# Altium PCB 0.PCB1.PcbDoc (part 1 of 12)
Units mm, origin at the board's own origin, x right, y up, seen from the top; angles counter-clockwise.
Board outline 77 x 72 mm, 6 copper layers (Top Layer, Layer 1, Layer 3, Layer 4, Layer 2, Bottom Layer), stack 1.538 mm thick; 570 components, 490 nets, 3331 pads, 1909 vias.
Unrouted connection lines stored in the file: 2.
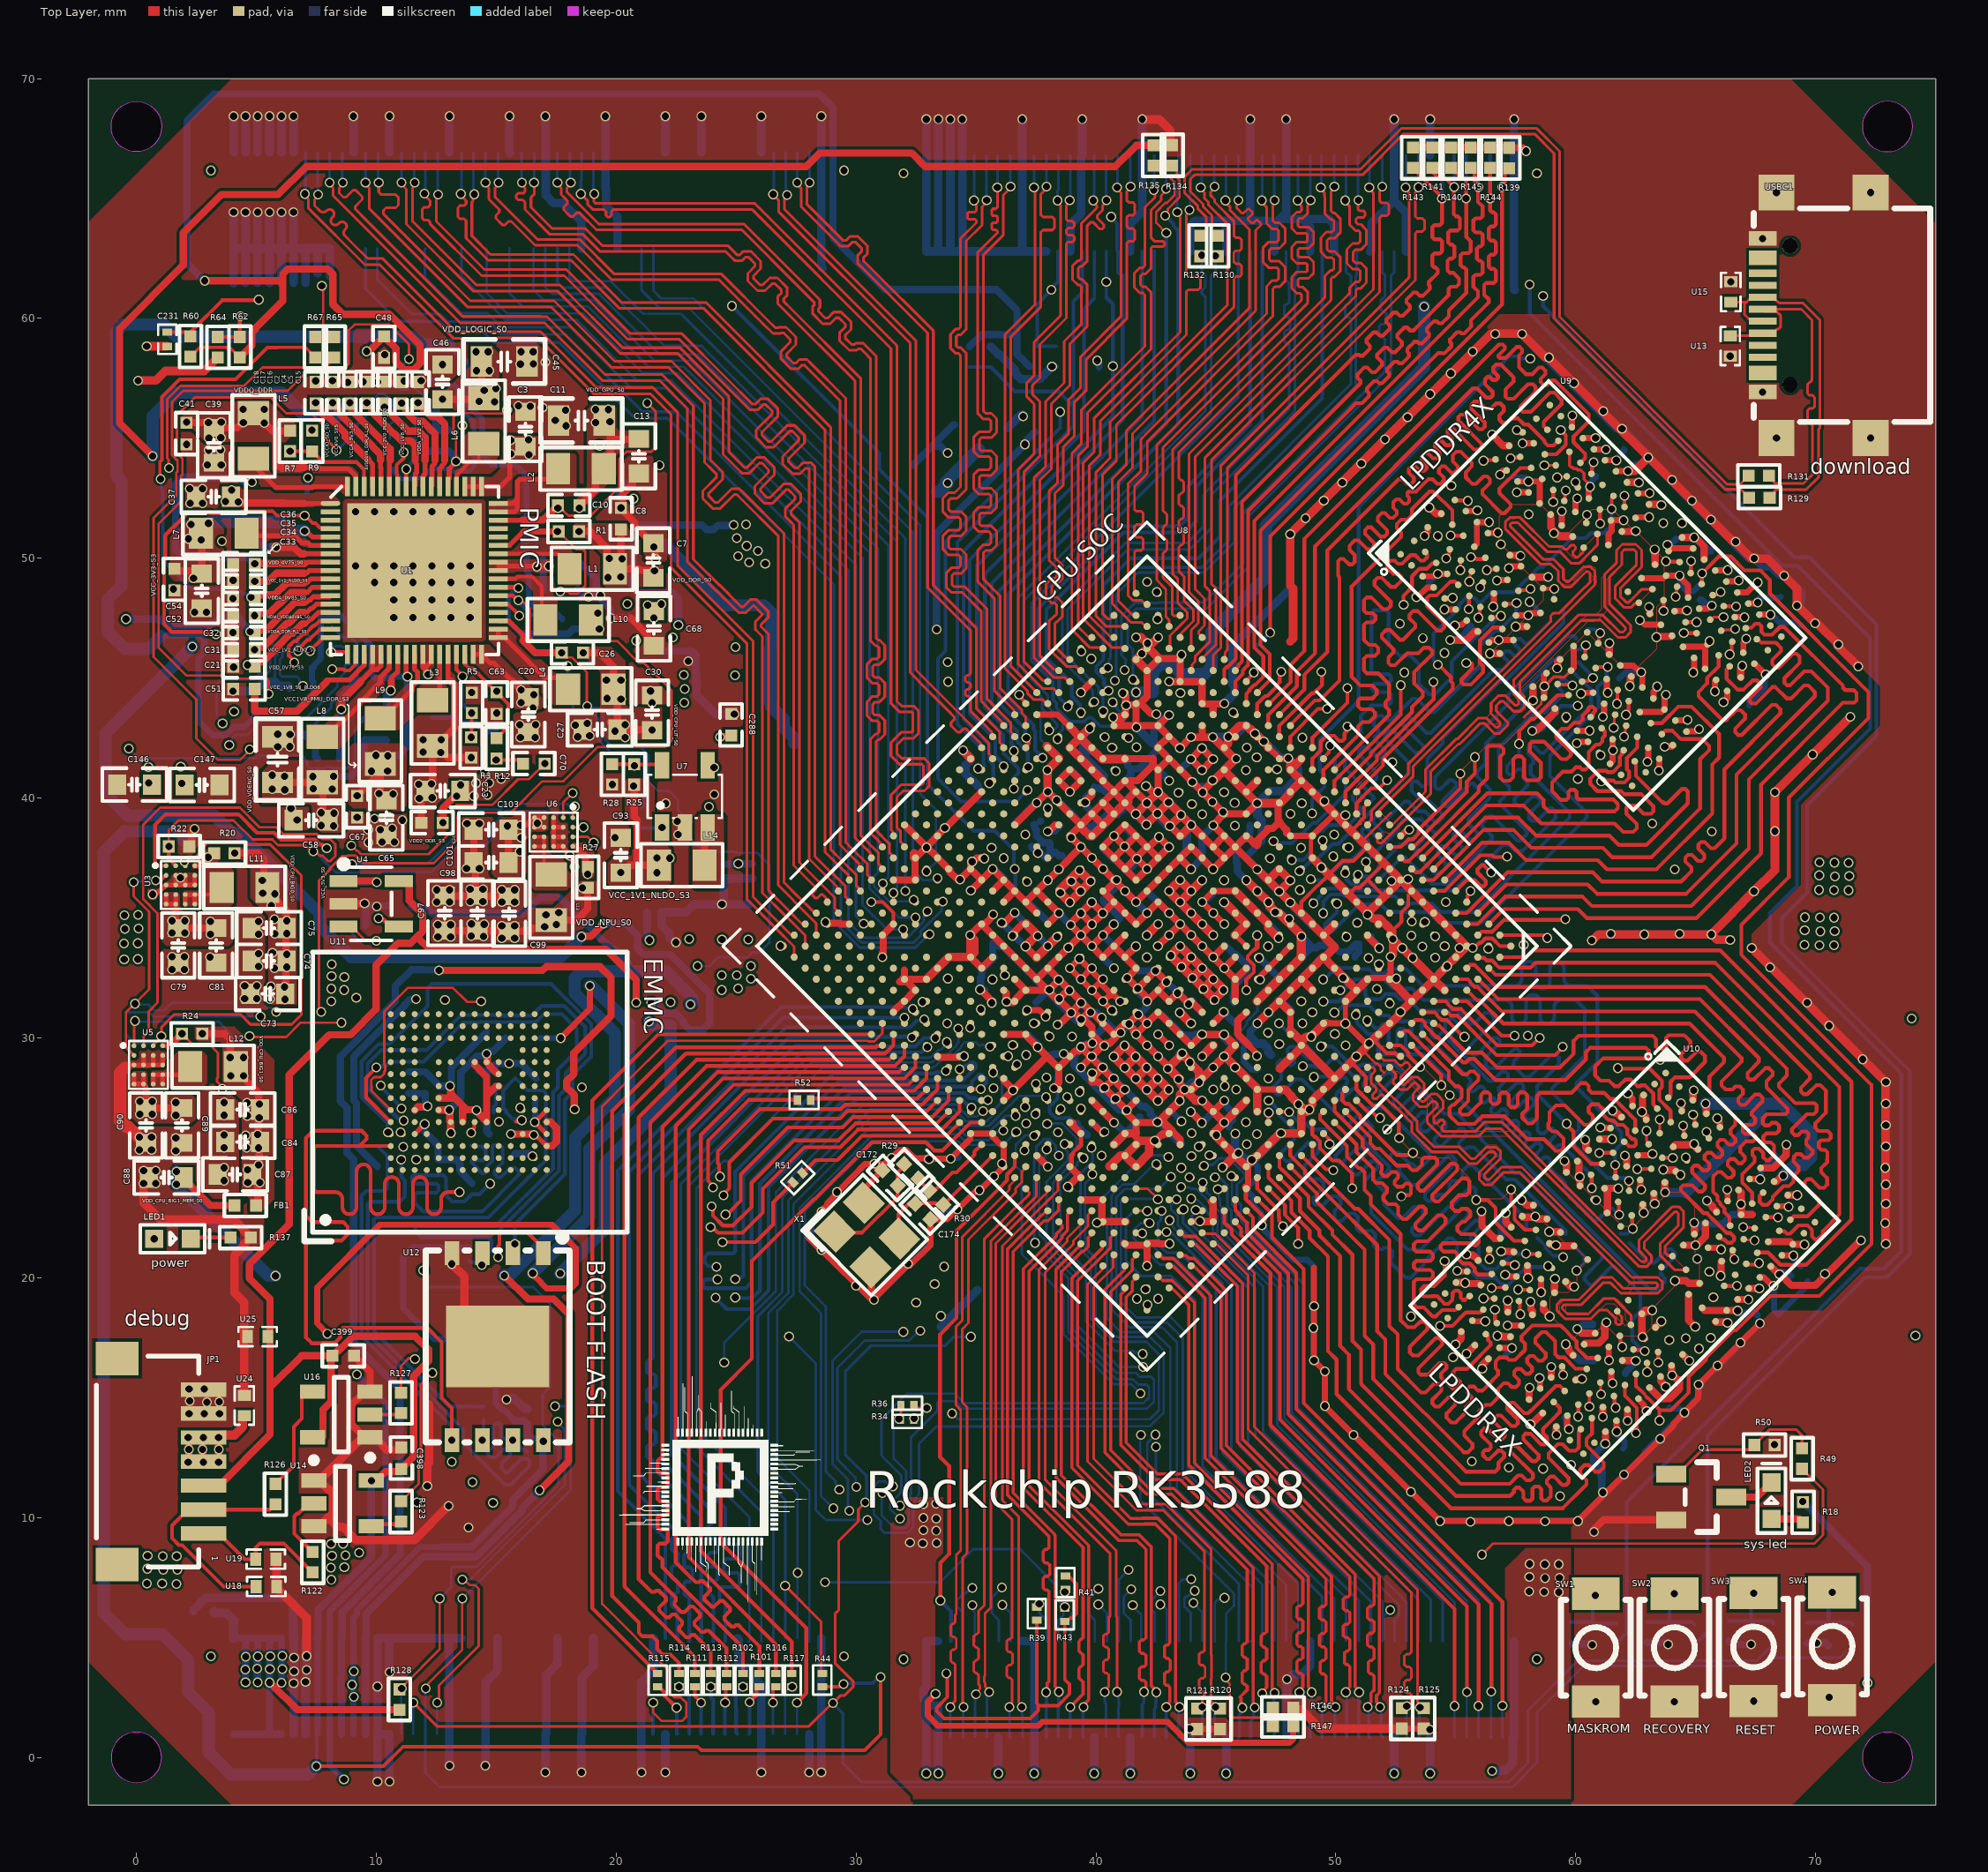
[diagram p0: Top Layer view]
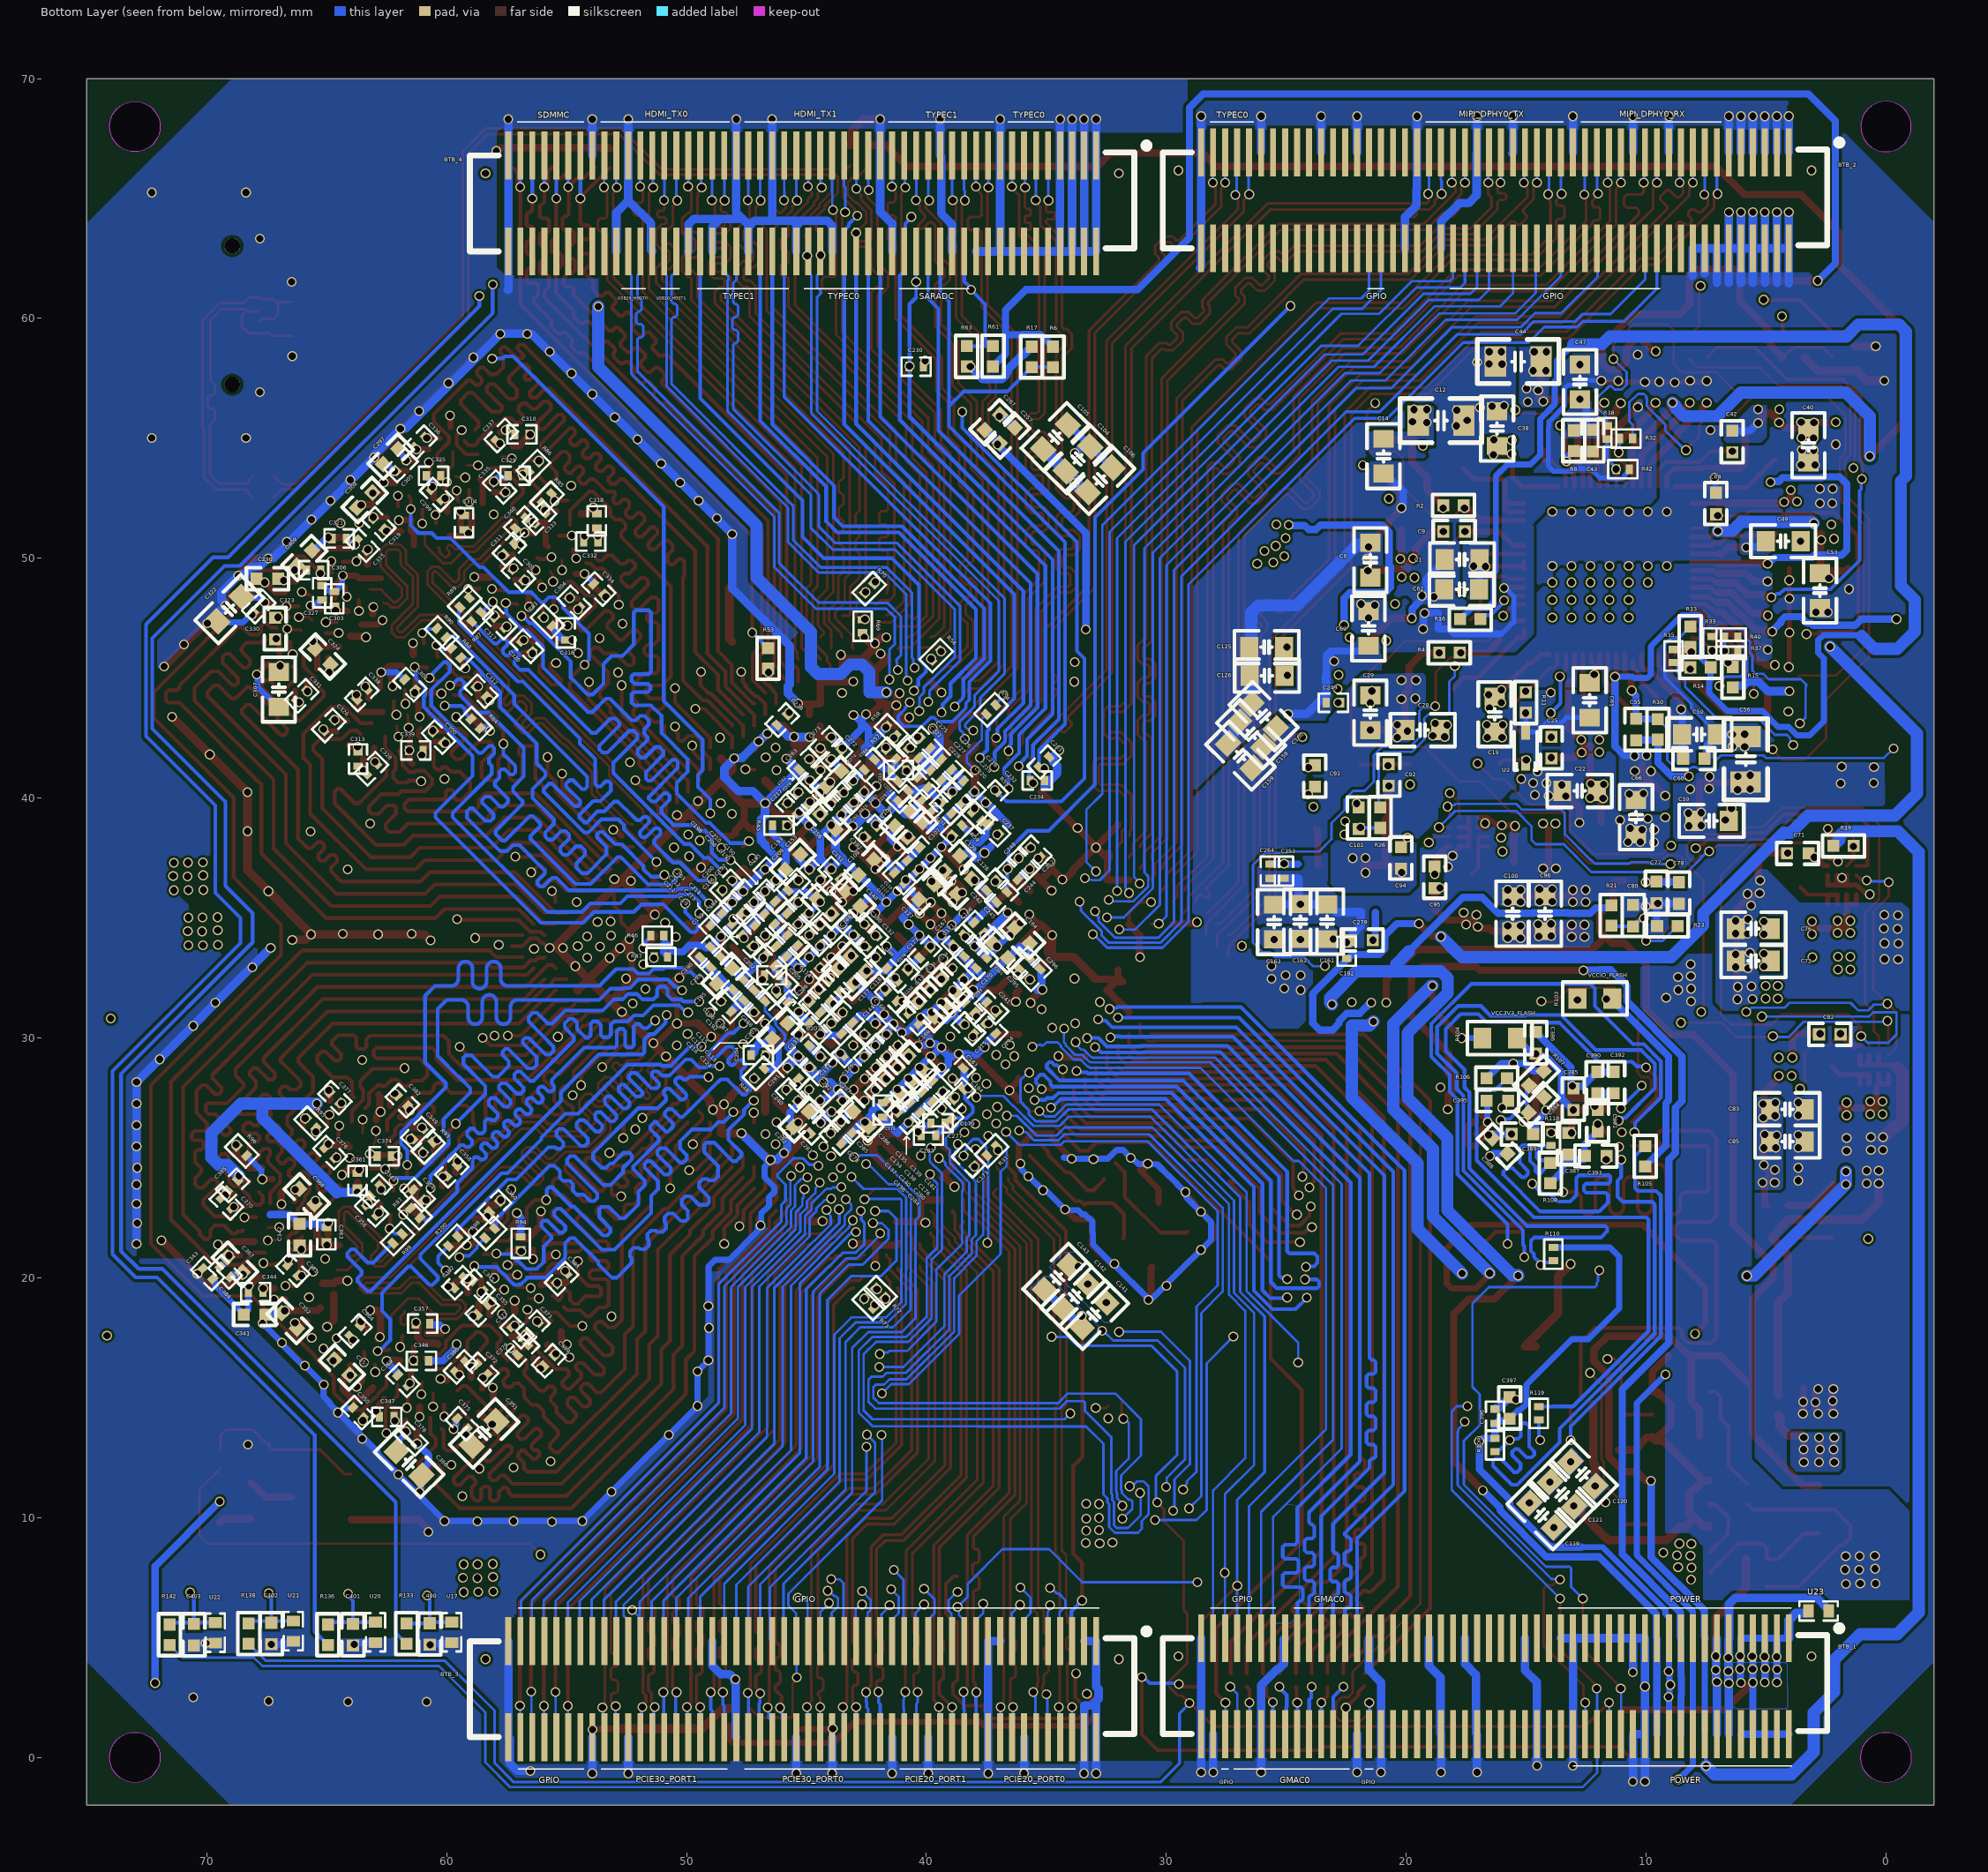
[diagram p1: Bottom Layer view, seen from below]
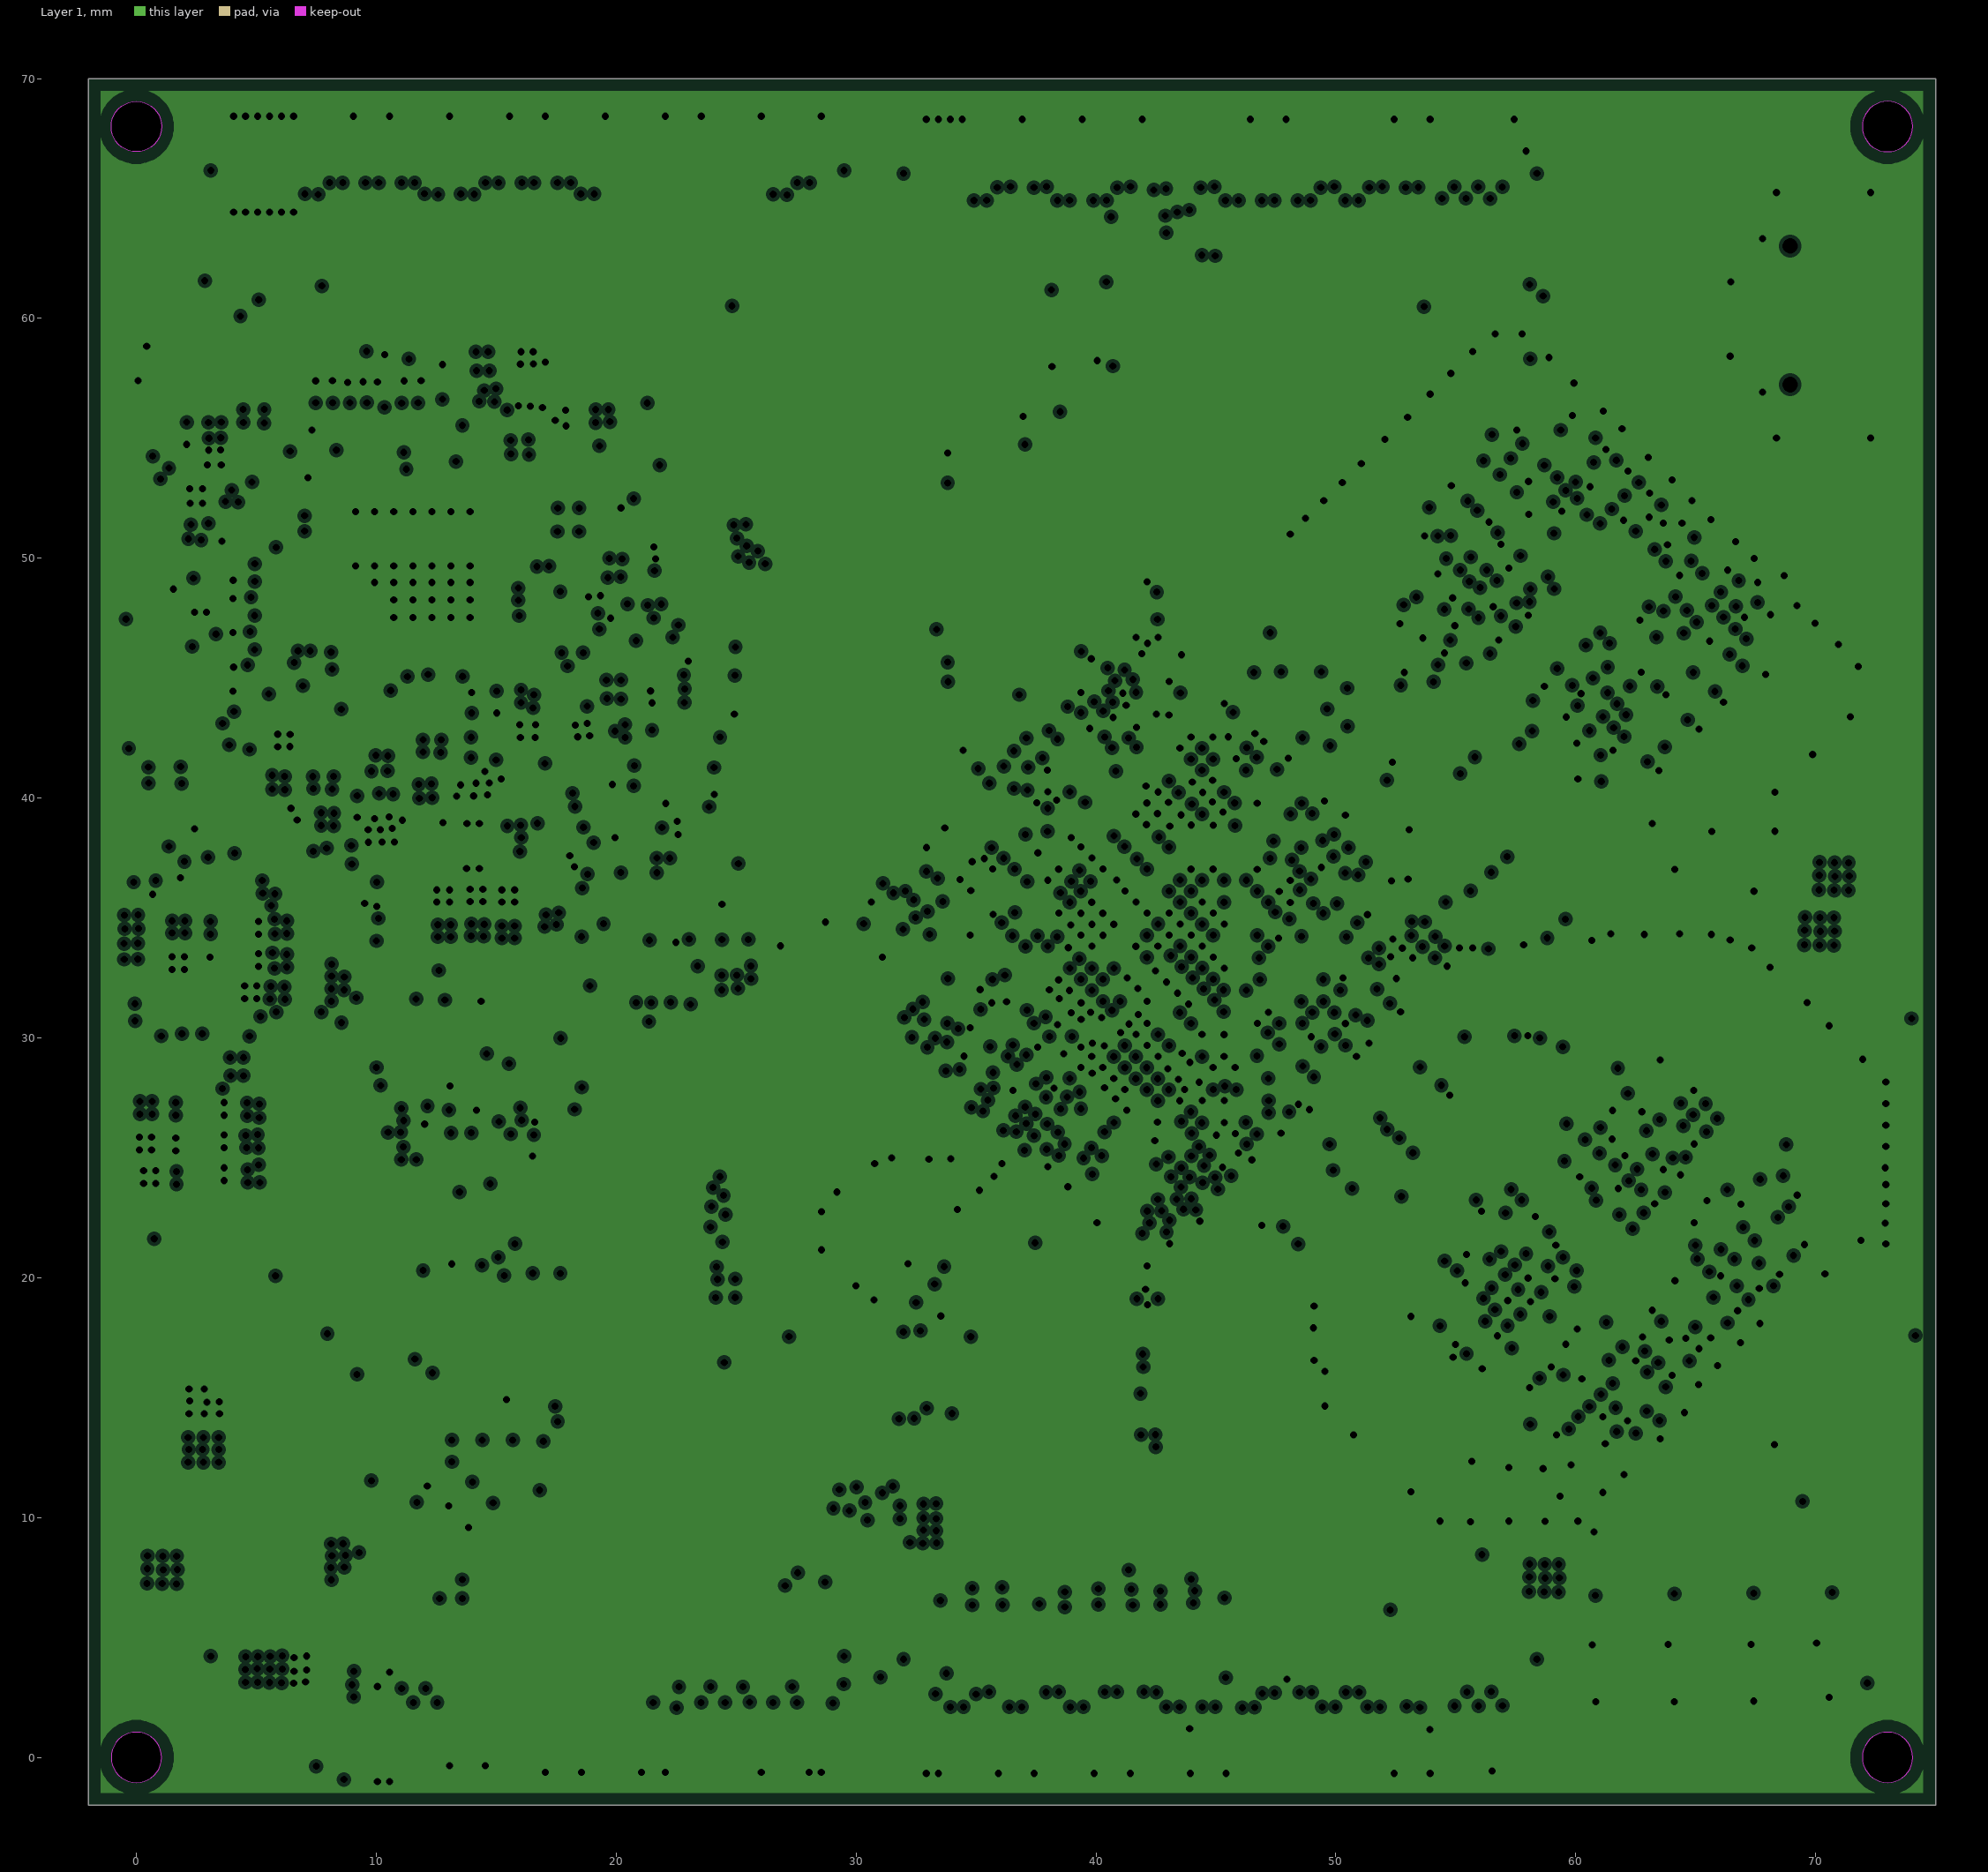
[diagram p2: Layer 1, clearances drawn from the general rule]
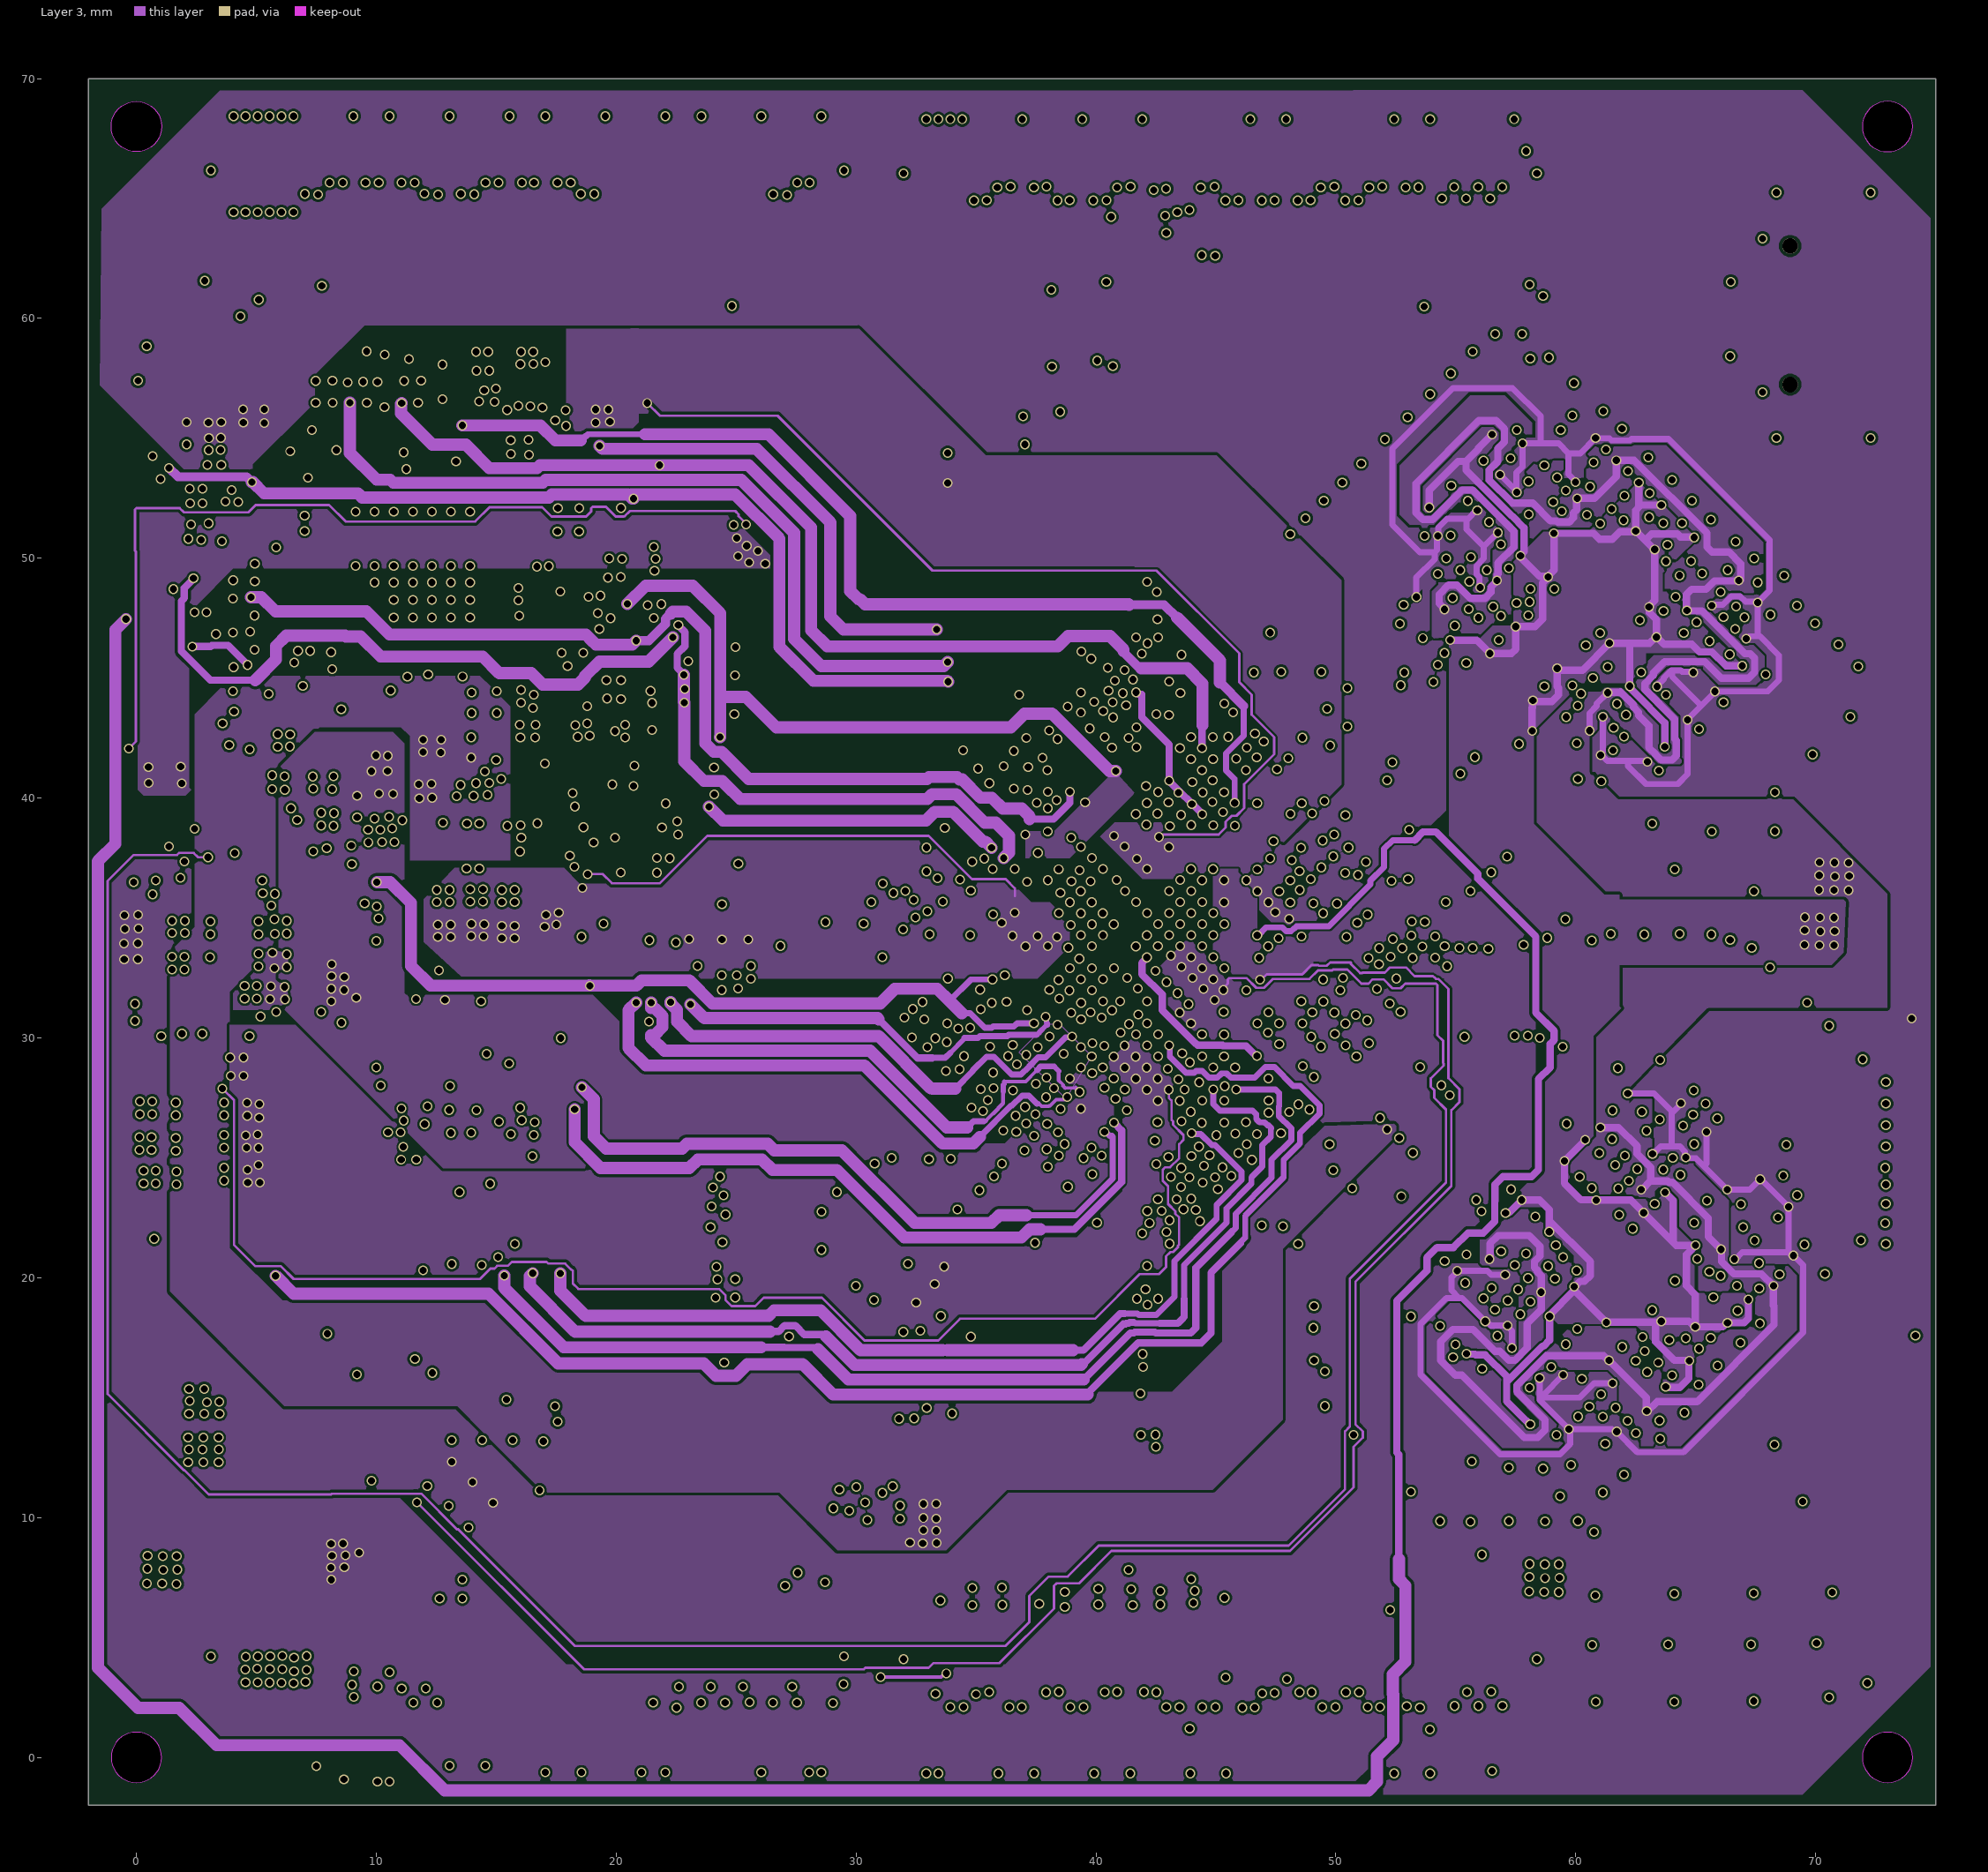
[diagram p3: Layer 3]
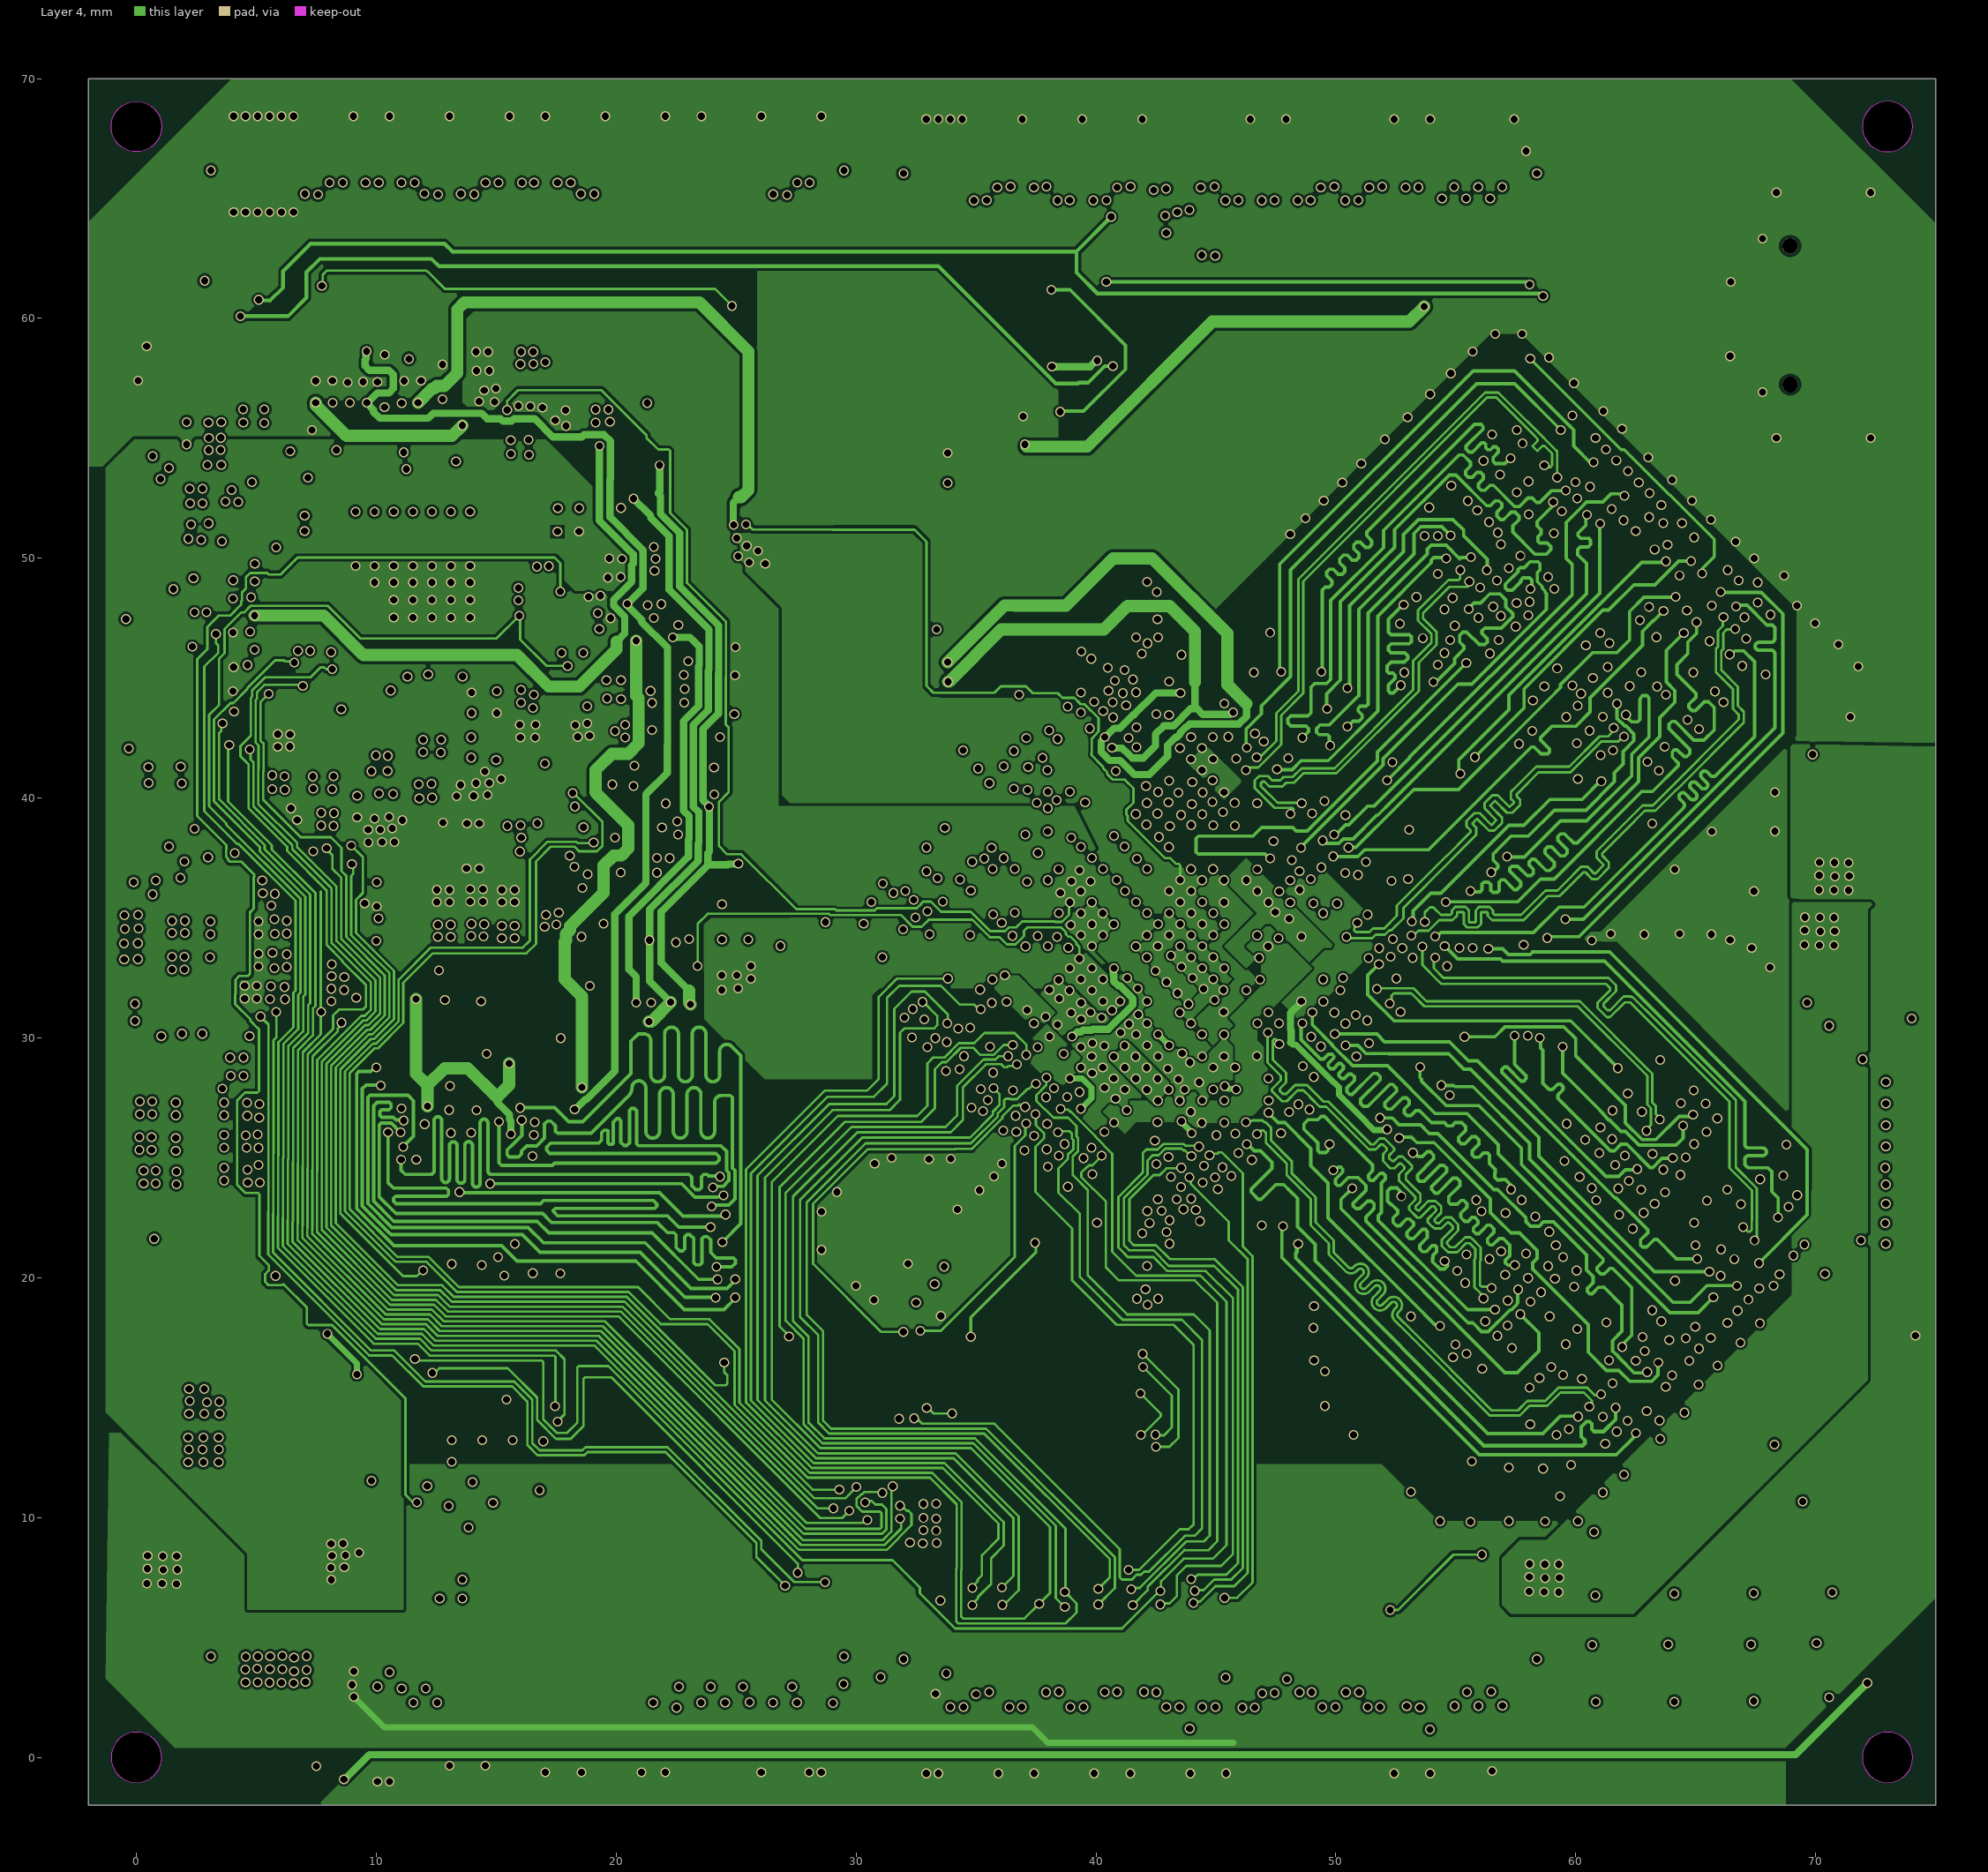
[diagram p4: Layer 4]
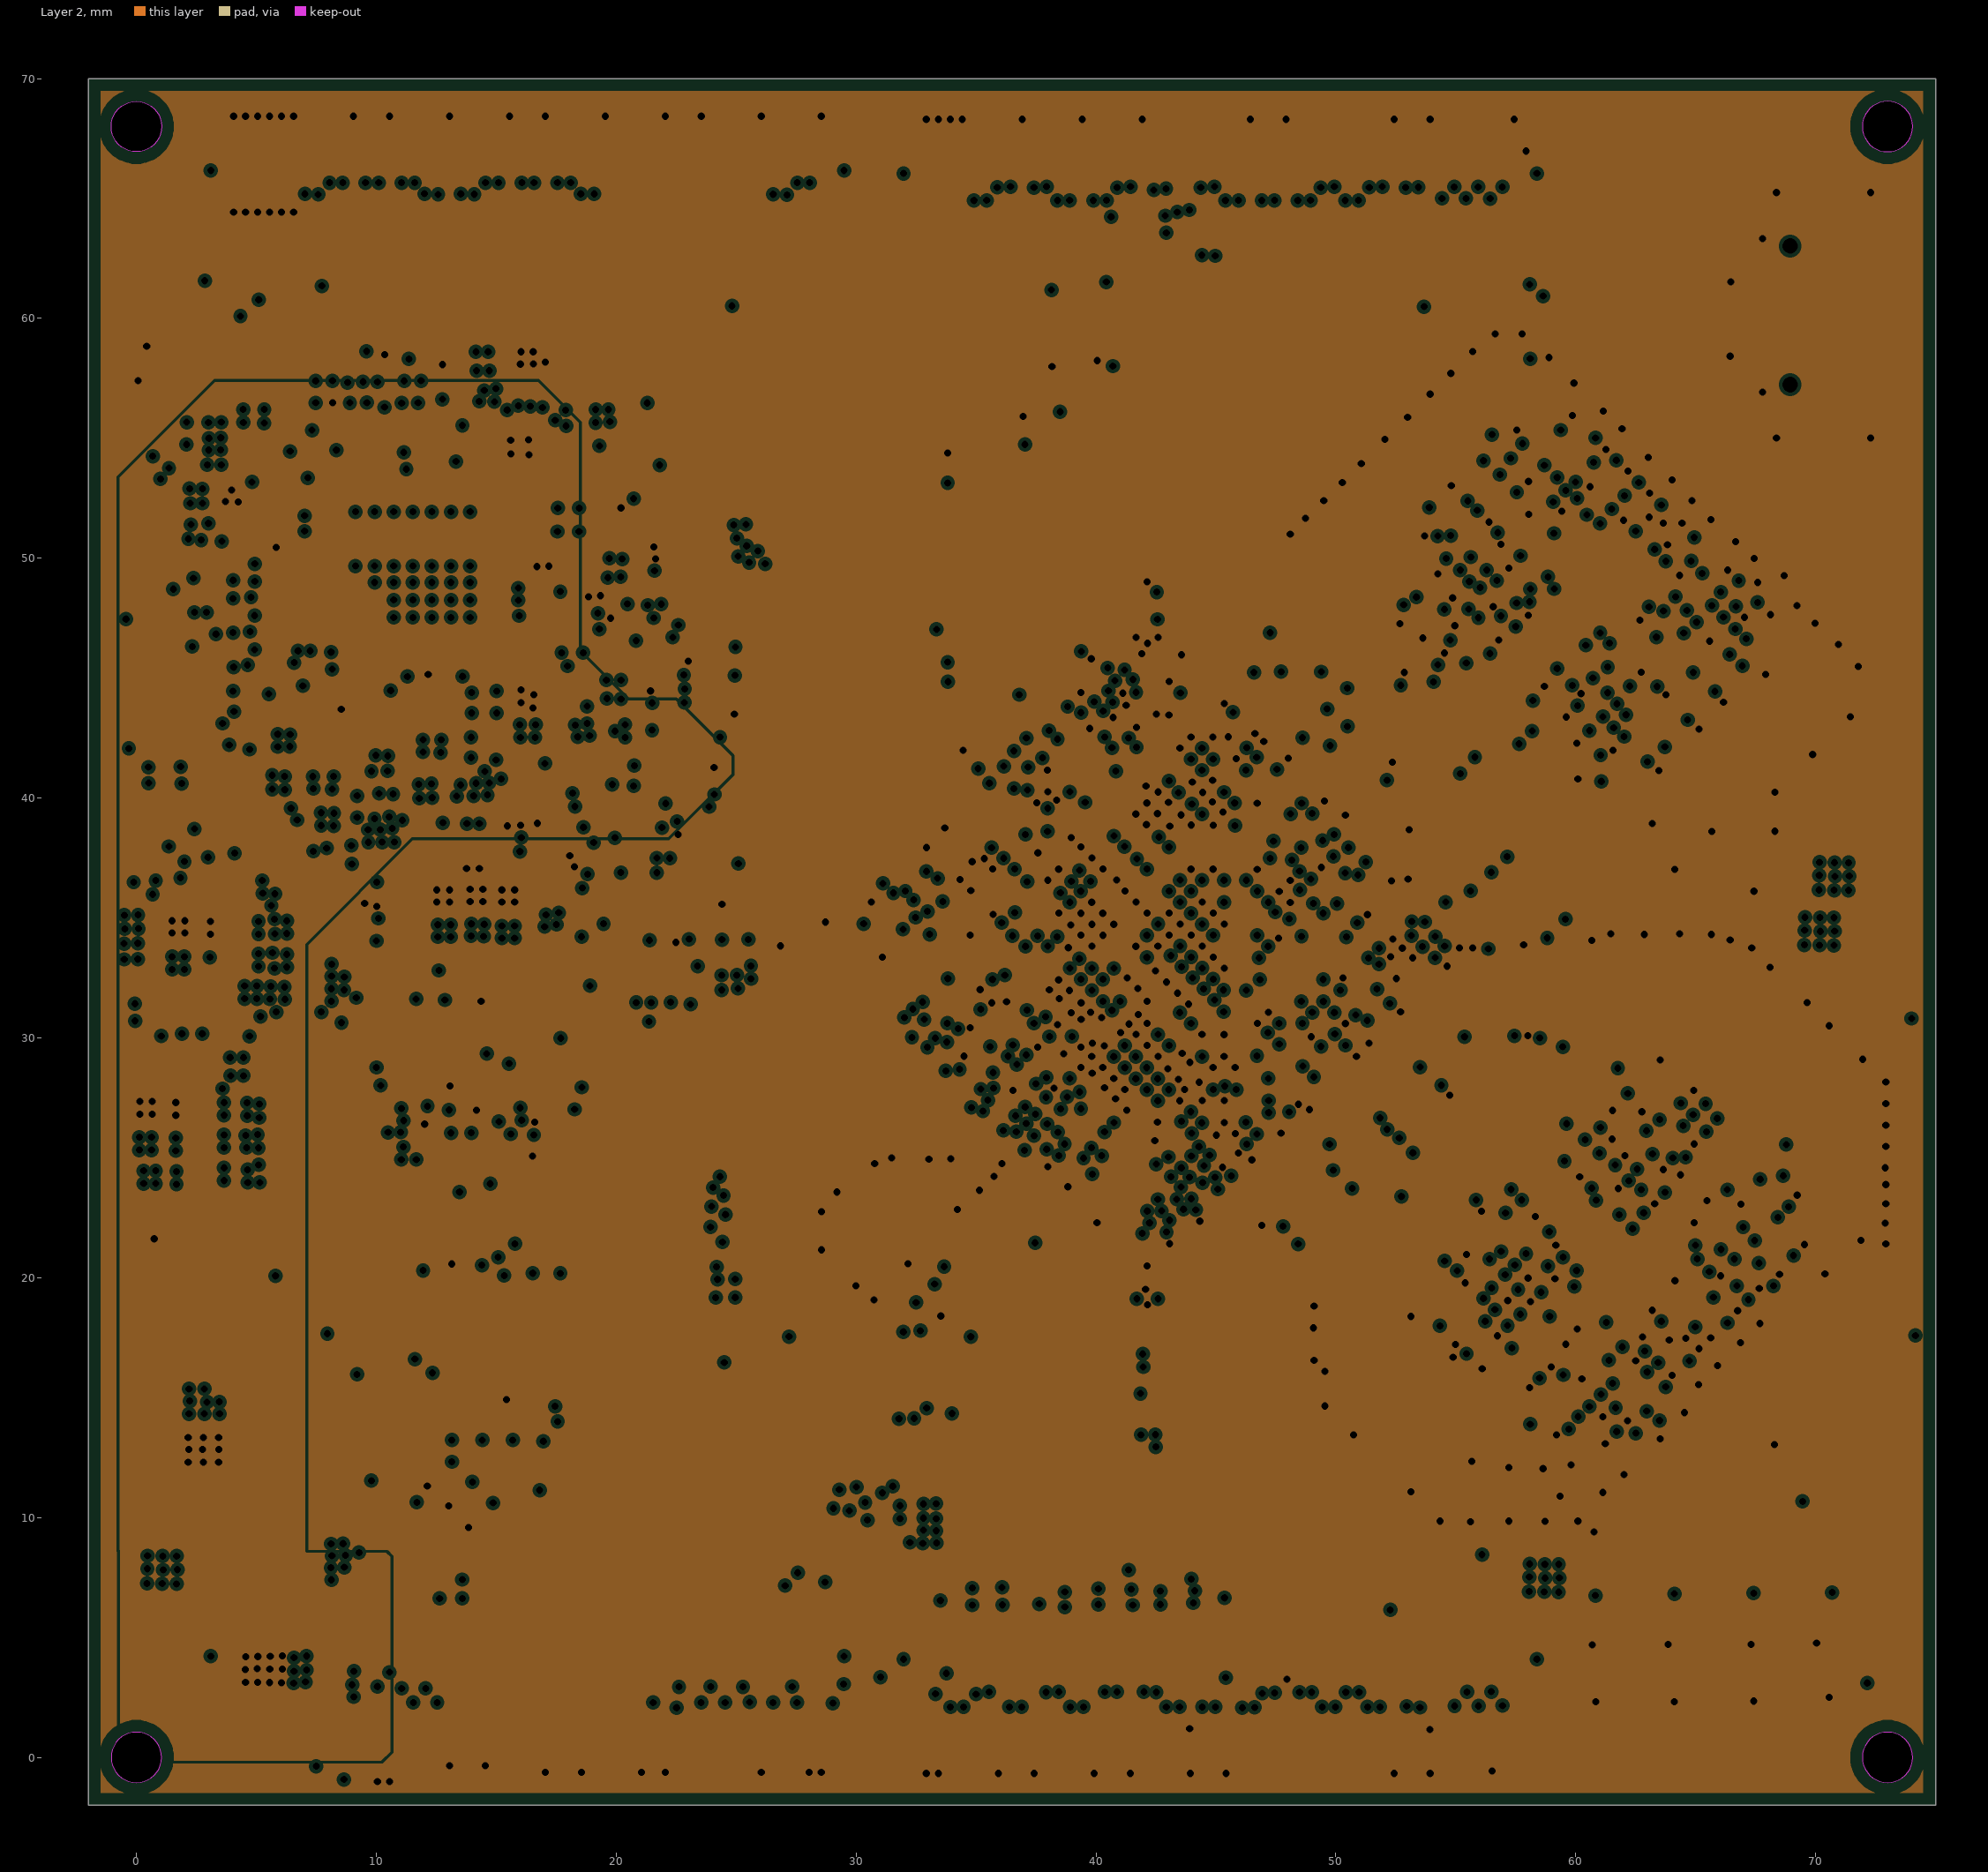
[diagram p5: Layer 2, clearances drawn from the general rule]
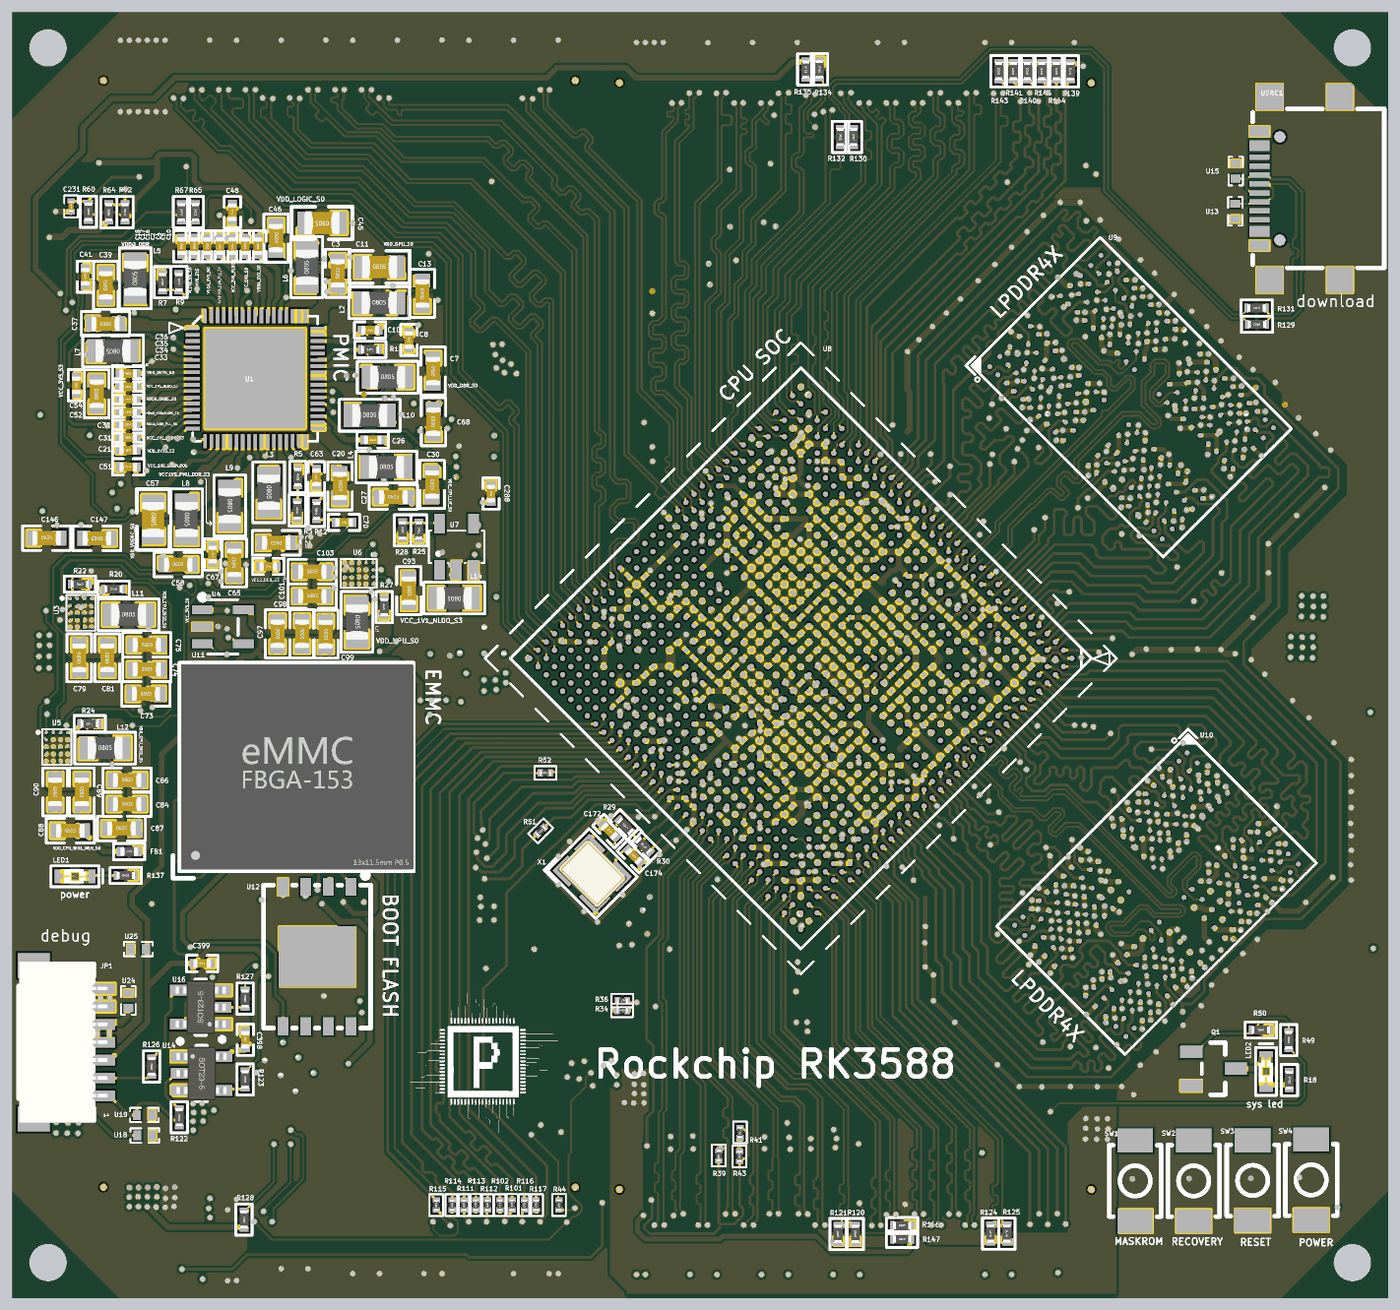
[diagram p17: 3D render of the assembled board from above, using the file's embedded part models]
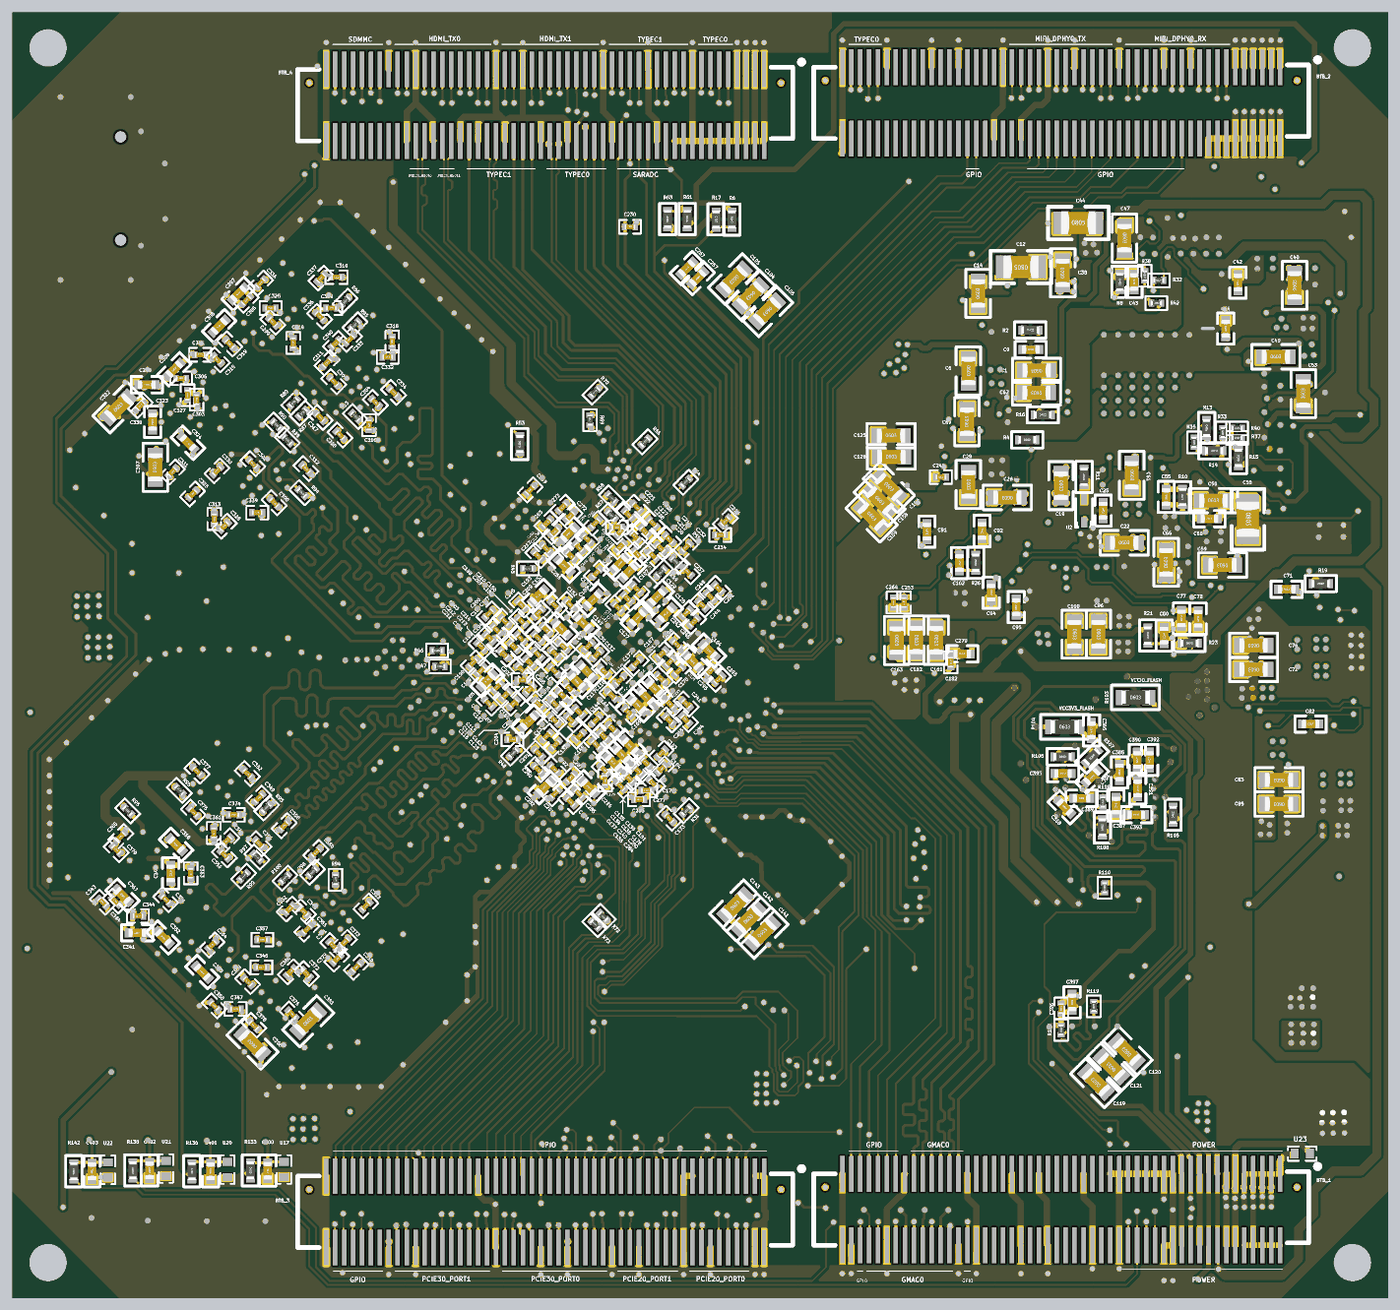
[diagram p18: 3D render of the assembled board from below, using the file's embedded part models]

## Layer stack, top to bottom
Top Solder: solder mask 0.0102, Solder Resist, Dk 3.5
Top Layer: signal copper 0.035
Dielectric 2: prepreg 0.0994, PP-006, Dk 4.1
Layer 1: plane copper 0.0152, net GND
Dielectric 4: core 0.55, PP-006, Dk 4.41
Layer 3: signal copper 0.0152
Dielectric 1: prepreg 0.1088, FR-4, Dk 4.1
Layer 4: signal copper 0.0152
Dielectric 5: core 0.55, PP-006, Dk 4.41
Layer 2: plane copper 0.0152, net (Multiple Nets)
Dielectric 3: prepreg 0.0994, PP-006, Dk 4.1
Bottom Layer: signal copper 0.035
Bottom Solder: solder mask 0.0102, Solder Resist, Dk 3.5

## Board outline
-2,-2 -2,70 75,70 75,-2
cut-out: 0,66.95 cw(c0,68) -1.05,68 cw(c0,68) 0,69.05 cw(c0,68) 1.05,68 cw(c0,68)
cut-out: 71.95,68 ccw(c73,68) 73,66.95 ccw(c73,68) 74.05,68 ccw(c73,68) 73,69.05 ccw(c73,68)
cut-out: 71.95,0 ccw(c73,0) 73,-1.05 ccw(c73,0) 74.05,0 ccw(c73,0) 73,1.05 ccw(c73,0)
cut-out: -1.05,0 ccw(c0,0) 0,-1.05 ccw(c0,0) 1.05,0 ccw(c0,0) 0,1.05 ccw(c0,0)

## Design rules (kind name [scope] priority, off if disabled: settings)
Clearance room_bga [WithinRoom('Room_rk3588') or WithinRoom('Room_ddr1') or WithinRoom('Room_ddr2') or WithinRoom('Room_emmc')] p1: gap=0.091 ignorepadtopadclearanceinfootprint=FALSE
Clearance via_poly [IsVia vs InPoly] p2: gap=0.102 ignorepadtopadclearanceinfootprint=FALSE
Clearance poly [InPoly] p3: gap=0.127 ignorepadtopadclearanceinfootprint=FALSE
Clearance via [IsVia vs IsVia] p4: gap=0.09 ignorepadtopadclearanceinfootprint=FALSE
Clearance Clearance_all [All] p5: gap=0.102 ignorepadtopadclearanceinfootprint=FALSE
DiffPairsRouting "90 ohm" [InDifferentialPairClass('01.DDR_CH0') or InDifferentialPairClass('04.DDR_CH1') or InDifferentialPairClass('21.USB0') or InDifferentialPairClass('22.USB1') or InDifferentialPairClass('19b.typec0_usb2.0') or InDifferentialPairClass('20b.typec1_usb2.0') or InDifferentialPairClass('35.download')] p1: maxlimit=0.152 minlimit=0.102 mostfreqgap=0.102 toplayer_minwidth=0.112 toplayer_maxwidth=0.112 toplayer_prefwidth=0.112 midlayer1_minwidth=0.105 midlayer1_maxwidth=0.105 midlayer1_prefwidth=0.105 midlayer2_minwidth=0.105 midlayer2_maxwidth=0.105 midlayer2_prefwidth=0.105 bottomlayer_minwidth=0.112 bottomlayer_maxwidth=0.112 bottomlayer_prefwidth=0.112 maxuncoupledlength=12.7
DiffPairsRouting "100 ohm" [InDifferentialPairClass('16_HDMI_TX0') or InDifferentialPairClass('17_HDMI_TX1') or InDifferentialPairClass('18_HDMI_RX') or InDifferentialPairClass('28b.PICE2.0 0 clock') or InDifferentialPairClass('29b.PCIE2.0 1 clock') or InDifferentialPairClass('31b.PCIE3.0 0 clock') or InDifferentialPairClass('32b.PCIE3.0 1 clock') or InDifferentialPairClass('28a.PICE2.0 0')] p2: maxlimit=0.356 minlimit=0.152 mostfreqgap=0.178 toplayer_maxgap=0.279 toplayer_prefgap=0.152 toplayer_minwidth=0.109 toplayer_maxwidth=0.109 toplayer_prefwidth=0.109 midlayer1_mingap=0.178 midlayer1_minwidth=0.107 midlayer1_maxwidth=0.107 midlayer1_prefwidth=0.107 midlayer2_mingap=0.178 midlayer2_minwidth=0.107 midlayer2_maxwidth=0.107 midlayer2_prefwidth=0.107 bottomlayer_maxgap=0.279 bottomlayer_prefgap=0.152 bottomlayer_minwidth=0.109 bottomlayer_maxwidth=0.109 bottomlayer_prefwidth=0.109 maxuncoupledlength=12.7
DiffPairsRouting 95ohm [InDifferentialPairClass('19a.typec0_usb3.0') or InDifferentialPairClass('20a.typec1_usb3.0')  or InDifferentialPairClass('10.MIPI_DPHY0_TX') or InDifferentialPairClass('11.MIPI_DPHY1_TX') or InDifferentialPairClass('12.MIPI_DPHY0_RX') or InDifferentialPairClass('13.MIPI_DPHY1_RX') or InDifferentialPairClass('14.MIPI_CSI0') or InDifferentialPairClass('15.MIPI_CSI1')] p3: maxlimit=0.203 minlimit=0.127 mostfreqgap=0.127 toplayer_minwidth=0.112 toplayer_maxwidth=0.112 toplayer_prefwidth=0.112 midlayer1_minwidth=0.104 midlayer1_maxwidth=0.104 midlayer1_prefwidth=0.104 midlayer2_minwidth=0.104 midlayer2_maxwidth=0.104 midlayer2_prefwidth=0.104 bottomlayer_minwidth=0.112 bottomlayer_maxwidth=0.112 bottomlayer_prefwidth=0.112 maxuncoupledlength=12.7
DiffPairsRouting 85ohm [InDifferentialPairClass('29a.PCIE2.0 1') or InDifferentialPairClass('30a.PCIE2.0 2') or InDifferentialPairClass('31a.PCIE3.0 0') or InDifferentialPairClass('32a.PCIE3.0 1')] p4: maxlimit=0.152 minlimit=0.102 mostfreqgap=0.102 toplayer_minwidth=0.131 toplayer_maxwidth=0.131 toplayer_prefwidth=0.131 midlayer1_minwidth=0.122 midlayer1_maxwidth=0.122 midlayer1_prefwidth=0.122 midlayer2_minwidth=0.122 midlayer2_maxwidth=0.122 midlayer2_prefwidth=0.122 bottomlayer_minwidth=0.131 bottomlayer_maxwidth=0.131 bottomlayer_prefwidth=0.131 maxuncoupledlength=12.7
MatchedLengths ddr_diff [InDifferentialPairClass('01.DDR_CH0') or InDifferentialPairClass('04.DDR_CH1')] p1: tolerance=25.4 checknetsindiffpair=TRUE checkdiffpairvsdiffpair=FALSE checkxsignals=FALSE checkothers=FALSE usedelayunits=TRUE delaytolerance=1.000000
MatchedLengths ddr_addr_data [InxSignalClass('01a.ddr1_low_data_a') or InxSignalClass('01b.ddr1_low_data_b') or InxSignalClass('02a.ddr1_high_data_a') or InxSignalClass('02b.ddr1_high_data_b') or InxSignalClass('03a.ddr1_command_a') or InxSignalClass('03b.ddr1_command_b')or InxSignalClass('04a.ddr2_low_data_c') or InxSignalClass('04b.ddr2_low_data_d') or InxSignalClass('05a.ddr2_high_data_c') or InxSignalClass('05b.ddr2_high_data_d') or InxSignalClass('06a.ddr2_command_c') or InxSignalClass('06b.ddr2_command_d')] p2: tolerance=25.4 checknetsindiffpair=FALSE checkdiffpairvsdiffpair=TRUE checkxsignals=TRUE checkothers=TRUE usedelayunits=TRUE delaytolerance=16.000000
MatchedLengths ddr_dqs_clk [InxSignalClass('03c.ddr1_dqs_clk_a') or InxSignalClass('03d.ddr1_dqs_clk_b') or InxSignalClass('06c.ddr2_dqs_clk_c') or InxSignalClass('06d.ddr2_dqs_clk_d')] p3: tolerance=25.4 checknetsindiffpair=FALSE checkdiffpairvsdiffpair=TRUE checkxsignals=TRUE checkothers=TRUE usedelayunits=TRUE delaytolerance=40.000000
PlaneClearance [All] p1: clearance=0.152
PlaneConnect [All] p1: pad.planeconnectstyle=Relief pad.reliefexpansion=0.508 pad.reliefentries=4 pad.reliefconductorwidth=0.254 pad.reliefairgap=0.254 via.planeconnectstyle=Direct via.reliefexpansion=0.508 via.reliefentries=4 via.reliefconductorwidth=0.254 via.reliefairgap=0.254
PolygonConnect [All] p1: thpad.connectstyle=Relief thpad.reliefconductorwidth=0.254 thpad.reliefentries=4 thpad.polygonreliefangle="90 Angle" thpad.airgapwidth=0.254 smdpad.connectstyle=Direct smdpad.reliefconductorwidth=0.5 smdpad.reliefentries=4 smdpad.polygonreliefangle="90 Angle" smdpad.airgapwidth=0.127 via.connectstyle=Direct via.reliefconductorwidth=0.254 via.reliefentries=4 via.polygonreliefangle="90 Angle" via.airgapwidth=0.254
RoomDefinition Room_ddr1 [All] p1: confinementstyle=ConfineOut formatcopy=TRUE lockcomponents=FALSE outline 58.897,57.402 58.897,57.376 69.59,46.683 62.427,39.52 51.734,50.214
RoomDefinition Room_pmic4 [False] p2: confinementstyle=ConfineIn formatcopy=TRUE lockcomponents=FALSE outline 18.469,39.463 18.469,37.685 16.284,37.685 16.284,39.463
RoomDefinition Room_pmic3 [False] p3: confinementstyle=ConfineIn formatcopy=TRUE lockcomponents=FALSE outline -0.438,29.944 1.34,29.944 1.34,27.76 -0.438,27.76
RoomDefinition Room_pmic2 [False] p4: confinementstyle=ConfineIn formatcopy=TRUE lockcomponents=FALSE outline 0.958,37.449 2.711,37.449 2.711,35.29 0.958,35.29
RoomDefinition Room_pmic1 [False] p5: confinementstyle=ConfineIn formatcopy=TRUE lockcomponents=FALSE outline 6.993,54.086 16.112,54.086 16.112,44.866 6.993,44.866
RoomDefinition Room_emmc [False] p6: confinementstyle=ConfineIn formatcopy=TRUE lockcomponents=FALSE outline 7.363,33.603 20.419,33.603 20.419,21.893 7.363,21.893
RoomDefinition Room_rk3588 [All] p7: confinementstyle=ConfineOut formatcopy=TRUE lockcomponents=FALSE outline 42.133,50.087 58.389,33.831 58.389,33.805 58.363,33.805 42.133,17.575 25.877,33.831
RoomDefinition Room_ddr2 [All] p8: confinementstyle=ConfineOut formatcopy=TRUE lockcomponents=FALSE outline 63.824,29.538 70.987,22.375 70.987,22.324 70.936,22.324 60.268,11.656 53.106,18.819
RoutingVias [All] p1: holewidth=0.3 width=0.41 viastyle="Through Hole" minholewidth=0.3 minwidth=0.41 maxholewidth=0.9 maxwidth=1
SolderMaskExpansion [All] p1: expansion=0.102 istentingtop=FALSE
Width lpddr4x [InNetClass('01.ddr1_low_data') or InNetClass('02.ddr1_high_data') or InNetClass('03.ddr1_other') or InNetClass('04.ddr2_low_data') or InNetClass('05.ddr2_high_data') or InNetClass('06.ddr2_other')] p1: maxlimit=0.156 minlimit=0.142 preferedwidth=0.156 toplayer_minwidth=0.156 midlayer1_maxwidth=0.142 midlayer1_prefwidth=0.142 midlayer2_maxwidth=0.142 midlayer2_prefwidth=0.142 bottomlayer_minwidth=0.156 minimp=50.000000 maximp=50.000000 favimp=50.000000
Width power_pmic [(WithinRoom('Room_pmic1') or WithinRoom('Room_pmic2') or WithinRoom('Room_pmic3') or WithinRoom('Room_pmic4')) and InNetClass('33.POWER')] p2: maxlimit=0.508 minlimit=0.102 preferedwidth=0.203 minimp=50.000000 maximp=50.000000 favimp=50.000000
Width power_rk3588 [WithinRoom('Room_rk3588') and InNetClass('33.POWER')] p3: maxlimit=0.508 minlimit=0.102 preferedwidth=0.203 minimp=50.000000 maximp=50.000000 favimp=50.000000
Width power [InNetClass('33.POWER')] p4: maxlimit=0.508 minlimit=0.102 preferedwidth=0.305 minimp=50.000000 maximp=50.000000 favimp=50.000000
Width other_50ohm [InNetClass('08.EMMC') or InNetClass('09.SDMMC') or InNetClass('10.MIPI_DPHY0_TX') or InNetClass('11.MIPI_DPHY1_TX') or InNetClass('12.MIPI_DPHY0_RX') or InNetClass('13.MIPI_DPHY1_RX') or InNetClass('14.MIPI_CSI0') or InNetClass('15.MIPI_CSI1') or InNetClass('16.HDMI_TX0') or InNetClass('17.HDMI_TX1') or InNetClass('18.HDMI_RX') or InNetClass('19.typec0') or InNetClass('20.typec1') or InNetClass('21.USB0') or InNetClass('22.USB1')or InNetClass('23.GMAC0') or InNetClass('24.GMAC1') or InNetClass('36.FSPI')] p5: maxlimit=0.156 minlimit=0.142 preferedwidth=0.156 toplayer_minwidth=0.156 midlayer1_maxwidth=0.142 midlayer1_prefwidth=0.142 midlayer2_maxwidth=0.142 midlayer2_prefwidth=0.142 bottomlayer_minwidth=0.156 minimp=50.000000 maximp=50.000000 favimp=50.000000
Width other [All] p6: maxlimit=0.508 minlimit=0.102 preferedwidth=0.156 midlayer1_prefwidth=0.142 midlayer2_prefwidth=0.142 minimp=50.000000 maximp=50.000000 favimp=50.000000
27 further rules are at their usual default settings.

## Classes and differential pairs
differential pair class 35.download: "35 01.download_typec" "35 02.typec0_usb20_OTG_R" "35 03.TYPEC0_USB20_OTG"
net class 36.FSPI: FSPI_CLK_M0 FSPI_CLK_M0_R FSPI_CS0N_M0 FSPI_D0_M0 FSPI_D1_M0 FSPI_D2_M0 FSPI_D3_M0
differential pair class 20b.typec1_usb2.0: "20 05.TYPEC1_USB20_OTG"
differential pair class 19b.typec0_usb2.0: "19 05.TYPEC0_USB20_OTG" "19 06.typec0_usb20_OTG_R" "19 07.typec_download"
net class 20b.typec1_usb2.0: TYPEC1_USB20_OTG_DM TYPEC1_USB20_OTG_DP
net class 19b.typec0_usb2.0: TYPEC0_USB20_OTG_DM TYPEC0_USB20_OTG_DM_R TYPEC0_USB20_OTG_DP TYPEC0_USB20_OTG_DP_R
net class 35.download: TYPEC0_USB20_OTG_DM TYPEC0_USB20_OTG_DM_R TYPEC0_USB20_OTG_DP TYPEC0_USB20_OTG_DP_R typec_dn typec_dp
differential pair class "32b.PCIE3.0 1 clock": "32 01.PCIE30_PORT1_REF_CLK"
differential pair class "31b.PCIE3.0 0 clock": "31 01.PCIE30_PORT0_REF_CLK"
differential pair class "29b.PCIE2.0 1 clock": "29 01.PCIE20_1_REFCLK"
differential pair class "28b.PICE2.0 0 clock": "28 01.PCIE20_0_REFCLK"
net class "32b.PCIE3.0 1 clock": PCIE30_PORT1_REF_CLKN PCIE30_PORT1_REF_CLKP
net class "31b.PCIE3.0 0 clock": PCIE30_PORT0_REF_CLKN PCIE30_PORT0_REF_CLKP
net class "29b.PCIE2.0 1 clock": PCIE20_1_REFCLKN PCIE20_1_REFCLKP
net class "28b.PCIE2.0 0 clock": PCIE20_0_REFCLKN PCIE20_0_REFCLKP
net class 06d.ddr2_dqs_clk_d: DDR_CH1_CLKN_D DDR_CH1_CLKP_D DDR_CH1_DQS0N_D DDR_CH1_DQS0P_D DDR_CH1_DQS1N_D DDR_CH1_DQS1P_D
net class 06c.ddr2_dqs_clk_c: DDR_CH1_CLKN_C DDR_CH1_CLKP_C DDR_CH1_DQS0N_C DDR_CH1_DQS0P_C DDR_CH1_DQS1N_C DDR_CH1_DQS1P_C
net class 03d.ddr1_dqs_clk_b: DDR_CH0_CLKN_B DDR_CH0_CLKP_B DDR_CH0_DQS0N_B DDR_CH0_DQS0P_B DDR_CH0_DQS1N_B DDR_CH0_DQS1P_B
net class 03c.ddr1_dqs_clk_a: DDR_CH0_CLKN_A DDR_CH0_CLKP_A DDR_CH0_DQS0N_A DDR_CH0_DQS0P_A DDR_CH0_DQS1N_A DDR_CH0_DQS1P_A
net class 34.GPIO: GMAC0_MDC GMAC0_MDC_R GMAC0_MDIO GMAC0_MDIO_R GPIO0_A0 GPIO0_B2 GPIO0_B7 GPIO0_C6 GPIO0_C7 GPIO0_D3 GPIO1_A2 GPIO1_A4 GPIO1_A7 GPIO1_B0 GPIO1_B1 GPIO1_C0 GPIO1_C1 GPIO1_C4 GPIO1_C6 GPIO1_D3 GPIO1_D5 GPIO2_C5 GPIO3_A6 GPIO3_B2 GPIO3_C0 GPIO3_D5 GPIO4_A3 GPIO4_B1 GPIO4_C6 HDMI_TX0_CEC_M0 HDMI_TX0_HPD_M0 HDMI_TX0_SCL_M0 HDMI_TX0_SDA_M0 HDMI_TX1_CEC_M0 HDMI_TX1_HPD_M0 HDMI_TX1_SCL_M0 HDMI_TX1_SDA_M0 I2C0_SCL_M2 I2C0_SDA_M2 I2C1_SCL_M2 I2C1_SDA_M2 I2C2_SCL_M4 I2C2_SDA_M4 I2C5_SCL_M3 I2C5_SDA_M3 I2C7_SCL_M0 I2C7_SDA_M0 I2C8_SCL_M2 I2C8_SDA_M2 I2S0_LRCK I2S0_MCLK I2S0_SCLK I2S0_SDI0 I2S0_SDO0 PCIE30X1_0_CLKREQN_M0 PCIE30X1_0_PERSTN_M0 PCIE30X1_0_WAKEN_M0 PCIE30X2_CLKREQN_M1 PCIE30X2_PERSTN_M1 PCIE30X2_WAKEN_M1 PCIE30X4_CLKREQN_M1 PCIE30X4_PERSTN_M1 PCIE30X4_WAKEN_M1 SARADC_IN0_BOOT SARADC_IN2 SARADC_IN3 SARADC_IN4 SDMMC_DET TYPEC0_SBU1 TYPEC0_SBU2 TYPEC0_USB20_OTG_ID TYPEC0_USB20_VBUSDET TYPEC1_SBU1 TYPEC1_SBU2 TYPEC1_USB20_OTG_ID TYPEC1_USB20_VBUSDET UART2_RX UART2_RX_M0_DEBUG UART2_TX UART2_TX_M0_DEBUG UART4_RX_M2 UART4_TX_M2 UART7_RX_M2 UART7_TX_M2
net class 06b.ddr2_command_d: DDR_CH1_A0_D DDR_CH1_A1_D DDR_CH1_A2_D DDR_CH1_A3_D DDR_CH1_A4_D DDR_CH1_A5_D DDR_CH1_CLKN_D DDR_CH1_CLKP_D DDR_CH1_LP4/4X_CKE0_D DDR_CH1_LP4/4X_CKE1_D DDR_CH1_LP4/4X_CS0_D DDR_CH1_LP4/4X_CS1_D
net class 03b.ddr1_command_b: DDR_CH0_A0_B DDR_CH0_A1_B DDR_CH0_A2_B DDR_CH0_A3_B DDR_CH0_A4_B DDR_CH0_A5_B DDR_CH0_CLKN_B DDR_CH0_CLKP_B DDR_CH0_LP4/4X_CKE0_B DDR_CH0_LP4/4X_CKE1_B DDR_CH0_LP4/4X_CS0_B DDR_CH0_LP4/4X_CS1_B
net class 05b.ddr2_high_data_d: DDR_CH1_DM1_D DDR_CH1_DQ8_D DDR_CH1_DQ9_D DDR_CH1_DQ10_D DDR_CH1_DQ11_D DDR_CH1_DQ12_D DDR_CH1_DQ13_D DDR_CH1_DQ14_D DDR_CH1_DQ15_D DDR_CH1_DQS1N_D DDR_CH1_DQS1P_D
net class 04b.ddr2_low_data_d: DDR_CH1_DM0_D DDR_CH1_DQ0_D DDR_CH1_DQ1_D DDR_CH1_DQ2_D DDR_CH1_DQ3_D DDR_CH1_DQ4_D DDR_CH1_DQ5_D DDR_CH1_DQ6_D DDR_CH1_DQ7_D DDR_CH1_DQS0N_D DDR_CH1_DQS0P_D
net class 02b.ddr1_high_data_b: DDR_CH0_DM1_B DDR_CH0_DQ8_B DDR_CH0_DQ9_B DDR_CH0_DQ10_B DDR_CH0_DQ11_B DDR_CH0_DQ12_B DDR_CH0_DQ13_B DDR_CH0_DQ14_B DDR_CH0_DQ15_B DDR_CH0_DQS1N_B DDR_CH0_DQS1P_B
net class 01b.ddr1_low_data_b: DDR_CH0_DM0_B DDR_CH0_DQ0_B DDR_CH0_DQ1_B DDR_CH0_DQ2_B DDR_CH0_DQ3_B DDR_CH0_DQ4_B DDR_CH0_DQ5_B DDR_CH0_DQ6_B DDR_CH0_DQ7_B DDR_CH0_DQS0N_B DDR_CH0_DQS0P_B
differential pair class "32a.PCIE3.0 1": "32 02.PCIE30_PORT1_TX0" "32 03.PCIE30_PORT1_TX1" "32 04.PCIE30_PORT1_RX0" "32 05.PCIE30_PORT1_RX1"
differential pair class "31a.PCIE3.0 0": "31 02.PCIE30_PORT0_TX0" "31 03.PCIE30_PORT0_TX1" "31 04.PCIE30_PORT0_RX0" "31 05.PCIE30_PORT0_RX1"
differential pair class "29a.PCIE2.0 1": "29 02.PCIE20_1_TX" "29 03.PCIE20_1_RX"
differential pair class "28a.PICE2.0 0": "28 02.PCIE20_0_TX" "28 03.PCIE20_0_RX"
differential pair class 22.USB1: "22 01.USB20_HOST1"
differential pair class 21.USB0: "21 01.USB20_HOST0"
differential pair class 20a.typec1_usb3.0: "20 01.TYPEC1_SSTX1" "20 02.TYPEC1_SSTX2" "20 03.TYPEC1_SSRX1" "20 04.TYPEC1_SSRX2"
differential pair class 19a.typec0_usb3.0: "19 01.TYPEC0_SSTX1" "19 02.TYPEC0_SSTX2" "19 03.TYPEC0_SSRX1" "19 04.TYPEC0_SSRX2"
differential pair class 18_HDMI_RX: "18 01.HDMI_RX_CLK" "18 02.HDMI_RX_D0" "18 03.HDMI_RX_D1" "18 04.HDMI_RX_D2"
differential pair class 17_HDMI_TX1: "17 01.HDMI_TX1_D0" "17 02.HDMI_TX1_D1" "17 03.HDMI_TX1_D2" "17 04.HDMI_TX1_D3" "17 05.HDMI_TX1_SBD"
differential pair class 16_HDMI_TX0: "16 01.HDMI_TX0_D0" "16 02.HDMI_TX0_D1" "16 03.HDMI_TX0_D2" "16 04.HDMI_TX0_D3" "16 05.HDMI_TX0_SBD"
differential pair class 15.MIPI_CSI1: "15 01.MIPI_CSI1_CLK0" "15 02.MIPI_CSI1_D0" "15 03.MIPI_CSI1_D1" "15 04.MIPI_CSI1_CLK1" "15 05.MIPI_CSI1_D2" "15 06.MIPI_CSI1_D3"
differential pair class 14.MIPI_CSI0: "14 01.MIPI_CSI0_CLK0" "14 02.MIPI_CSI0_D0" "14 03.MIPI_CSI0_D1" "14 04.MIPI_CSI0_CLK1" "14 05.MIPI_CSI0_D2" "14 06.MIPI_CSI0_D3"
differential pair class 13.MIPI_DPHY1_RX: "13 01.MIPI_DPHY1_RX_CLK" "13 02.MIPI_DPHY1_RX_D0" "13 03.MIPI_DPHY1_RX_D1" "13 04.MIPI_DPHY1_RX_D2" "13 05.MIPI_DPHY1_RX_D3"
differential pair class 12.MIPI_DPHY0_RX: "12 01.MIPI_DPHY0_RX_CLK" "12 02.MIPI_DPHY0_RX_D0" "12 03.MIPI_DPHY0_RX_D1" "12 04.MIPI_DPHY0_RX_D2" "12 05.MIPI_DPHY0_RX_D3"
differential pair class 11.MIPI_DPHY1_TX: "11 01.MIPI_DPHY1_TX_CLK" "11 02.MIPI_DPHY1_TX_D0" "11 03.MIPI_DPHY1_TX_D1" "11 04.MIPI_DPHY1_TX_D2" "11 05.MIPI_DPHY1_TX_D3"
differential pair class 10.MIPI_DPHY0_TX: "10 01.MIPI_DPHY0_TX_CLK" "10 02.MIPI_DPHY0_TX_D0" "10 03.MIPI_DPHY0_TX_D1" "10 04.MIPI_DPHY0_TX_D2" "10 05.MIPI_DPHY0_TX_D3"
differential pair class 04.DDR_CH1: "04 01.DDR_CH1_CLK_C" "04 02.DDR_CH1_DQS0_C" "04 03.DDR_CH1_DQS1_C" "04 04.DDR_CH1_CLK_D" "04 05.DDR_CH1_DQS0_D" "04 06.DDR_CH1_DQS1_D"
differential pair class 01.DDR_CH0: "01 01.DDR_CH0_CLK_A" "01 02.DDR_CH0_DQS0_A" "01 03.DDR_CH0_DQS1_A" "01 04.DDR_CH0_CLK_B" "01 05.DDR_CH0_DQS0_B" "01 06.DDR_CH0_DQS1_B"
net class "32a.PCIE3.0 1": PCIE30_PORT1_RX0N PCIE30_PORT1_RX0P PCIE30_PORT1_RX1N PCIE30_PORT1_RX1P PCIE30_PORT1_TX0N PCIE30_PORT1_TX0P PCIE30_PORT1_TX1N PCIE30_PORT1_TX1P
net class "31a.PCIE3.0 0": PCIE30_PORT0_RX0N PCIE30_PORT0_RX0P PCIE30_PORT0_RX1N PCIE30_PORT0_RX1P PCIE30_PORT0_TX0N PCIE30_PORT0_TX0P PCIE30_PORT0_TX1N PCIE30_PORT0_TX1P
net class "29a.PCIE2.0 1": PCIE20_1_RXN PCIE20_1_RXP PCIE20_1_TXN PCIE20_1_TXP
net class "28a.PCIE2.0 0": PCIE20_0_RXN PCIE20_0_RXP PCIE20_0_TXN PCIE20_0_TXP
net class 27.sound: I2C7_SCL_M0 I2C7_SDA_M0 I2S0_LRCK I2S0_MCLK I2S0_SCLK I2S0_SDI0 I2S0_SDO0
net class 23.GMAC0: GMAC0_MCLKINOUT GMAC0_MCLKINOUT_R GMAC0_RXCLK GMAC0_RXD0 GMAC0_RXD1 GMAC0_RXD2 GMAC0_RXD3 GMAC0_RXDV_CRS GMAC0_TXCLK GMAC0_TXCLK_R GMAC0_TXD0 GMAC0_TXD0_R GMAC0_TXD1 GMAC0_TXD1_R GMAC0_TXD2 GMAC0_TXD2_R GMAC0_TXD3 GMAC0_TXD3_R GMAC0_TXEN GMAC0_TXEN_R
net class 22.USB1: USB20_HOST1_DM USB20_HOST1_DP
net class 21.USB0: USB20_HOST0_DM USB20_HOST0_DP
net class 20a.typec1_usb3.0: TYPEC1_SSRX1N TYPEC1_SSRX1P TYPEC1_SSRX2N TYPEC1_SSRX2P TYPEC1_SSTX1N TYPEC1_SSTX1P TYPEC1_SSTX2N TYPEC1_SSTX2P
net class 19a.typec0_usb3.0: TYPEC0_SSRX1N TYPEC0_SSRX1P TYPEC0_SSRX2N TYPEC0_SSRX2P TYPEC0_SSTX1N TYPEC0_SSTX1P TYPEC0_SSTX2N TYPEC0_SSTX2P
net class 17.HDMI_TX1: HDMI_TX1_D0N HDMI_TX1_D0P HDMI_TX1_D1N HDMI_TX1_D1P HDMI_TX1_D2N HDMI_TX1_D2P HDMI_TX1_D3N HDMI_TX1_D3P HDMI_TX1_SBDN HDMI_TX1_SBDP
net class 16.HDMI_TX0: HDMI_TX0_D0N HDMI_TX0_D0P HDMI_TX0_D1N HDMI_TX0_D1P HDMI_TX0_D2N HDMI_TX0_D2P HDMI_TX0_D3N HDMI_TX0_D3P HDMI_TX0_SBDN HDMI_TX0_SBDP
net class 12.MIPI_DPHY0_RX: MIPI_DPHY0_RX_CLKN MIPI_DPHY0_RX_CLKP MIPI_DPHY0_RX_D0N MIPI_DPHY0_RX_D0P MIPI_DPHY0_RX_D1N MIPI_DPHY0_RX_D1P MIPI_DPHY0_RX_D2N MIPI_DPHY0_RX_D2P MIPI_DPHY0_RX_D3N MIPI_DPHY0_RX_D3P
net class 10.MIPI_DPHY0_TX: MIPI_DPHY0_TX_CLKN MIPI_DPHY0_TX_CLKP MIPI_DPHY0_TX_D0N MIPI_DPHY0_TX_D0P MIPI_DPHY0_TX_D1N MIPI_DPHY0_TX_D1P MIPI_DPHY0_TX_D2N MIPI_DPHY0_TX_D2P MIPI_DPHY0_TX_D3N MIPI_DPHY0_TX_D3P
net class 09.SDMMC: SDMMC_CLK SDMMC_CLK_R SDMMC_CMD SDMMC_D0 SDMMC_D1 SDMMC_D2 SDMMC_D3
net class 08.EMMC: EMMC_CLKOUT EMMC_CLKOUT_R EMMC_D4 EMMC_D5 EMMC_D7 EMMC_DATA_STROBE EMMC_RSTN EMMC_RSTN_R FSPI_CLK_M0 FSPI_CS0N_M0 FSPI_D0_M0 FSPI_D1_M0 FSPI_D2_M0 FSPI_D3_M0
net class 33.POWER: AVDD1V8_DDR_PLL_S0 GND HDMI_VDDA0V85_S0 VCC1V8_PMU_DDR_S3 VCC3V3_FLASH VCC4V0_SYS VCC_1V1_NLDO_S3 VCC_1V8_S0 VCC_1V8_S3_PLDO6 VCC_2V0_PLDO_S3 VCC_3V3_S0 VCC_3V3_S3 VCCA_3V3_S0 VCCIO_FLASH VCCIO_SD_S0 VDD2_DDR_S3 VDD_0V75_S0 VDD_0V75_S3 VDD_CPU_BIG0_S0 VDD_CPU_BIG1_MEM_S0 VDD_CPU_BIG1_S0 VDD_CPU_LIT_S0 VDD_DDR_S0 VDD_GPU_S0 VDD_LOGIC_S0 VDD_NPU_S0 VDD_VDENC_S0 VDDA_0V85_S0 VDDA_1V2_S0 VDDA_DDR_PLL_S0 VDDQ_DDR
net class 06a.ddr2_command_c: DDR_CH1_A0_C DDR_CH1_A1_C DDR_CH1_A2_C DDR_CH1_A3_C DDR_CH1_A4_C DDR_CH1_A5_C DDR_CH1_CLKN_C DDR_CH1_CLKP_C DDR_CH1_LP4/4X_CKE0_C DDR_CH1_LP4/4X_CKE1_C DDR_CH1_LP4/4X_CS0_C DDR_CH1_LP4/4X_CS1_C
net class 03a.ddr1_command_a: DDR_CH0_A0_A DDR_CH0_A1_A DDR_CH0_A2_A DDR_CH0_A3_A DDR_CH0_A4_A DDR_CH0_A5_A DDR_CH0_CLKN_A DDR_CH0_CLKP_A DDR_CH0_LP4/4X_CKE0_A DDR_CH0_LP4/4X_CKE1_A DDR_CH0_LP4/4X_CS0_A DDR_CH0_LP4/4X_CS1_A
net class 05a.ddr2_high_data_c: DDR_CH1_DM1_C DDR_CH1_DQ8_C DDR_CH1_DQ9_C DDR_CH1_DQ10_C DDR_CH1_DQ11_C DDR_CH1_DQ12_C DDR_CH1_DQ13_C DDR_CH1_DQ14_C DDR_CH1_DQ15_C DDR_CH1_DQS1N_C DDR_CH1_DQS1P_C
net class 02a.ddr1_high_data_a: DDR_CH0_DM1_A DDR_CH0_DQ8_A DDR_CH0_DQ9_A DDR_CH0_DQ10_A DDR_CH0_DQ11_A DDR_CH0_DQ12_A DDR_CH0_DQ13_A DDR_CH0_DQ14_A DDR_CH0_DQ15_A DDR_CH0_DQS1N_A DDR_CH0_DQS1P_A
net class 04a.ddr2_low_data_c: DDR_CH1_DM0_C DDR_CH1_DQ0_C DDR_CH1_DQ1_C DDR_CH1_DQ2_C DDR_CH1_DQ3_C DDR_CH1_DQ4_C DDR_CH1_DQ5_C DDR_CH1_DQ6_C DDR_CH1_DQ7_C DDR_CH1_DQS0N_C DDR_CH1_DQS0P_C
net class 01a.ddr1_low_data_a: DDR_CH0_DM0_A DDR_CH0_DQ0_A DDR_CH0_DQ1_A DDR_CH0_DQ2_A DDR_CH0_DQ3_A DDR_CH0_DQ4_A DDR_CH0_DQ5_A DDR_CH0_DQ6_A DDR_CH0_DQ7_A DDR_CH0_DQS0N_A DDR_CH0_DQS0P_A
component class 21.RK3588_CONFIG: C398 C399 C400 C401 C402 C403 JP1 LED1 LED2 Q1 R18 R49 R50 R120 R121 R122 R123 R124 R125 R126 R127 R128 R129 R130 R131 R132 R133 R134 R135 R136 R137 R138 R139 R140 R141 R142 R143 R144 R145 R146 R147 SW1 SW2 SW3 SW4 U13 U14 U15 U16 U17 U18 U19 U20 U21 U22 U24 U25 USBC1
component class 20.BTB: BTB_1 BTB_2 BTB_3 BTB_4 U23
component class 19.EMMC_FLASH: C385 C386 C387 C388 C389 C390 C391 C392 C393 C394 C395 C396 C397 R103 R104 R105 R106 R107 R108 R109 R110 R118 R119 U11 U12
component class 18.LPDDR4_LPDDR4x_2: C341 C342 C343 C344 C345 C346 C347 C348 C349 C350 C351 C352 C353 C354 C355 C356 C357 C358 C359 C360 C361 C362 C363 C364 C365 C366 C367 C368 C369 C370 C371 C372 C373 C374 C375 C376 C377 C378 C379 C380 C381 C382 C383 C384 R93 R94 R95 R96 R97 R98 R99 R100 U10
component class 17.LPDDR4_LPDDR4x_1: C297 C298 C299 C300 C301 C302 C303 C304 C305 C306 C307 C308 C309 C310 C311 C312 C313 C314 C315 C316 C317 C318 C319 C320 C321 C322 C323 C324 C325 C326 C327 C328 C329 C330 C331 C332 C333 C334 C335 C336 C337 C338 C339 C340 R83 R84 R85 R86 R87 R88 R89 R90 U9
component class 16.RK3588_VCCIO6: C295 C296
component class 15.RK3588_VCCIO5: C293 C294
component class 14.RK3588_VCCIO4: C291 C292
component class 13.RK3588_PCIE2.0_PCIE3.0: C277 C278 C279 C280 C281 C282 C283 C284 C285 C286 C287 C288 R72 R73
component class 12.RK3588_MIPI_CSI_HDMI2.1_HDMI: C256 C257 C260 C262 C263 C264 C265 C266 C267 C270 C272 C273 C274 R69 R70
component class 11.RK3588_MIPI_D_C_PHY0_1: C242 C244 C245 C248 C249 C252 C253 R65 R67
component class 10.RK3588_VCCIO1_VCCIO3_SARADC: C230 C231 C232 C233 C234 C237 C239 C240 C241 R6 R17 R60 R61 R62 R63 R64 R101 R102 R111 R112 R113 R114 R115 R116 R117
component class 9.RK3588_USB_Controler: C218 C219 C220 C221 C222 C223 C224 C225 C226 C227 C228 C229 R54 R55 R56 R57 R58 R59
component class 8.RK3588_EMMCIO_VCCIO2: C215 C216 C217 R51 R52 R53
component class 7.RK3588_DDR_Controler: C185 C186 C187 C188 C189 C190 C191 C192 C193 C194 C195 C196 C197 C198 C199 C200 C201 C202 C203 C204 C205 C206 C207 C208 C209 C210 C211 C212 C213 C214 R45 R46 R47 R48 U8
component class 5.RK3588_OSC_PLL_PMUIO1: C172 C173 C174 C175 C176 C177 C178 C179 C180 C181 C182 R29 R30 R31 R32 R33 R34 R35 R36 X1
component class 2.PMIC_2: C71 C72 C73 C74 C75 C76 C77 C78 C79 C80 C81 C82 C83 C84 C85 C86 C87 C88 C89 C90 C91 C92 C93 C94 C95 C96 C97 C98 C99 C100 C101 C102 C103 FB1 L11 L12 L13 L14 R19 R20 R21 R22 R23 R24 R25 R26 R27 R28 U3 U4 U5 U6 U7
component class 3.RK3588_POWER: C104 C105 C106 C107 C108 C109 C110 C111 C112 C113 C114 C115 C116 C117 C118 C119 C120 C121 C122 C123 C124 C125 C126 C127 C128 C129 C130 C131 C132 C133 C134 C135 C136 C137 C138 C139 C140 C141 C142 C143 C144 C145 C146 C147 C148 C149 C150 C151 C152 C153 C154 C155 C156 C157 C158 C159 C160 C161 C162 C163 C164 C165 C166 C167 C168 C169 C170 C171
component class 6.RK3588_PMUIO2: C183 C184 R37 R38 R39 R40 R41 R42 R43 R44
component class 1.PMIC_1: C1 C2 C3 C4 C5 C6 C7 C8 C9 C10 C11 C12 C13 C14 C15 C16 C17 C18 C19 C20 C21 C22 C23 C24 C25 C26 C27 C28 C29 C30 C31 C32 C33 C34 C35 C36 C37 C38 C39 C40 C41 C42 C43 C44 C45 C46 C47 C48 C49 C50 C51 C52 C53 C54 C55 C56 C57 C58 C59 C60 C61 C62 C63 C64 C65 C66 C67 C68 C69 C70 L1 L2 L3 L4 L5 L6 L7 L8 L9 L10 R1 R2 R3 R4 R5 R7 R8 R9 R10 R11 R12 R13 R14 R15 R16 U1 U2
differential pair "35 03.TYPEC0_USB20_OTG": +TYPEC0_USB20_OTG_DP -TYPEC0_USB20_OTG_DM
differential pair "35 02.typec0_usb20_OTG_R": +TYPEC0_USB20_OTG_DP_R -TYPEC0_USB20_OTG_DM_R
differential pair "35 01.download_typec": +typec_dp -typec_dn
differential pair "19 07.typec_download": +typec_dp -typec_dn
differential pair "19 06.typec0_usb20_OTG_R": +TYPEC0_USB20_OTG_DM_R -TYPEC0_USB20_OTG_DP_R
differential pair "32 05.PCIE30_PORT1_RX1": +PCIE30_PORT1_RX1P -PCIE30_PORT1_RX1N
differential pair "32 04.PCIE30_PORT1_RX0": +PCIE30_PORT1_RX0P -PCIE30_PORT1_RX0N
differential pair "32 03.PCIE30_PORT1_TX1": +PCIE30_PORT1_TX1P -PCIE30_PORT1_TX1N
differential pair "32 02.PCIE30_PORT1_TX0": +PCIE30_PORT1_TX0P -PCIE30_PORT1_TX0N
differential pair "32 01.PCIE30_PORT1_REF_CLK": +PCIE30_PORT1_REF_CLKP -PCIE30_PORT1_REF_CLKN
differential pair "31 05.PCIE30_PORT0_RX1": +PCIE30_PORT0_RX1P -PCIE30_PORT0_RX1N
differential pair "31 04.PCIE30_PORT0_RX0": +PCIE30_PORT0_RX0P -PCIE30_PORT0_RX0N
differential pair "31 03.PCIE30_PORT0_TX1": +PCIE30_PORT0_TX1P -PCIE30_PORT0_TX1N
differential pair "31 02.PCIE30_PORT0_TX0": +PCIE30_PORT0_TX0P -PCIE30_PORT0_TX0N
differential pair "31 01.PCIE30_PORT0_REF_CLK": +PCIE30_PORT0_REF_CLKP -PCIE30_PORT0_REF_CLKN
differential pair "29 03.PCIE20_1_RX": +PCIE20_1_RXP -PCIE20_1_RXN
differential pair "29 02.PCIE20_1_TX": +PCIE20_1_TXP -PCIE20_1_TXN
differential pair "29 01.PCIE20_1_REFCLK": +PCIE20_1_REFCLKP -PCIE20_1_REFCLKN
differential pair "28 03.PCIE20_0_RX": +PCIE20_0_RXP -PCIE20_0_RXN
differential pair "28 02.PCIE20_0_TX": +PCIE20_0_TXP -PCIE20_0_TXN
differential pair "28 01.PCIE20_0_REFCLK": +PCIE20_0_REFCLKP -PCIE20_0_REFCLKN
differential pair "22 01.USB20_HOST1": +USB20_HOST1_DP -USB20_HOST1_DM
differential pair "21 01.USB20_HOST0": +USB20_HOST0_DP -USB20_HOST0_DM
differential pair "20 05.TYPEC1_USB20_OTG": +TYPEC1_USB20_OTG_DP -TYPEC1_USB20_OTG_DM
differential pair "20 04.TYPEC1_SSRX2": +TYPEC1_SSRX2P -TYPEC1_SSRX2N
differential pair "20 03.TYPEC1_SSRX1": +TYPEC1_SSRX1P -TYPEC1_SSRX1N
differential pair "20 02.TYPEC1_SSTX2": +TYPEC1_SSTX2P -TYPEC1_SSTX2N
differential pair "20 01.TYPEC1_SSTX1": +TYPEC1_SSTX1P -TYPEC1_SSTX1N
differential pair "19 05.TYPEC0_USB20_OTG": +TYPEC0_USB20_OTG_DP -TYPEC0_USB20_OTG_DM
differential pair "19 04.TYPEC0_SSRX2": +TYPEC0_SSRX2P -TYPEC0_SSRX2N
differential pair "19 02.TYPEC0_SSTX2": +TYPEC0_SSTX2P -TYPEC0_SSTX2N
differential pair "19 01.TYPEC0_SSTX1": +TYPEC0_SSTX1P -TYPEC0_SSTX1N
differential pair "19 03.TYPEC0_SSRX1": +TYPEC0_SSRX1P -TYPEC0_SSRX1N
differential pair "16 01.HDMI_TX0_D0": +HDMI_TX0_D0P -HDMI_TX0_D0N
differential pair "16 02.HDMI_TX0_D1": +HDMI_TX0_D1P -HDMI_TX0_D1N
differential pair "16 03.HDMI_TX0_D2": +HDMI_TX0_D2P -HDMI_TX0_D2N
differential pair "16 04.HDMI_TX0_D3": +HDMI_TX0_D3P -HDMI_TX0_D3N
differential pair "16 05.HDMI_TX0_SBD": +HDMI_TX0_SBDP -HDMI_TX0_SBDN
differential pair "17 01.HDMI_TX1_D0": +HDMI_TX1_D0P -HDMI_TX1_D0N
differential pair "17 02.HDMI_TX1_D1": +HDMI_TX1_D1P -HDMI_TX1_D1N
differential pair "17 03.HDMI_TX1_D2": +HDMI_TX1_D2P -HDMI_TX1_D2N
differential pair "17 04.HDMI_TX1_D3": +HDMI_TX1_D3P -HDMI_TX1_D3N
differential pair "17 05.HDMI_TX1_SBD": +HDMI_TX1_SBDP -HDMI_TX1_SBDN
differential pair "12 05.MIPI_DPHY0_RX_D3": +MIPI_DPHY0_RX_D3P -MIPI_DPHY0_RX_D3N
differential pair "12 03.MIPI_DPHY0_RX_D1": +MIPI_DPHY0_RX_D1P -MIPI_DPHY0_RX_D1N
differential pair "12 04.MIPI_DPHY0_RX_D2": +MIPI_DPHY0_RX_D2P -MIPI_DPHY0_RX_D2N
differential pair "12 02.MIPI_DPHY0_RX_D0": +MIPI_DPHY0_RX_D0P -MIPI_DPHY0_RX_D0N
differential pair "12 01.MIPI_DPHY0_RX_CLK": +MIPI_DPHY0_RX_CLKP -MIPI_DPHY0_RX_CLKN
differential pair "13 05.MIPI_DPHY1_RX_D3": +"" -""
differential pair "13 04.MIPI_DPHY1_RX_D2": +"" -""
differential pair "13 03.MIPI_DPHY1_RX_D1": +"" -""
differential pair "13 02.MIPI_DPHY1_RX_D0": +"" -""
differential pair "13 01.MIPI_DPHY1_RX_CLK": +"" -""
differential pair "11 05.MIPI_DPHY1_TX_D3": +"" -""
differential pair "11 04.MIPI_DPHY1_TX_D2": +"" -""
differential pair "11 03.MIPI_DPHY1_TX_D1": +"" -""
differential pair "11 02.MIPI_DPHY1_TX_D0": +"" -""
differential pair "11 01.MIPI_DPHY1_TX_CLK": +"" -""
differential pair "10 05.MIPI_DPHY0_TX_D3": +MIPI_DPHY0_TX_D3P -MIPI_DPHY0_TX_D3N
differential pair "10 04.MIPI_DPHY0_TX_D2": +MIPI_DPHY0_TX_D2P -MIPI_DPHY0_TX_D2N
differential pair "10 03.MIPI_DPHY0_TX_D1": +MIPI_DPHY0_TX_D1P -MIPI_DPHY0_TX_D1N
differential pair "10 02.MIPI_DPHY0_TX_D0": +MIPI_DPHY0_TX_D0P -MIPI_DPHY0_TX_D0N
differential pair "10 01.MIPI_DPHY0_TX_CLK": +MIPI_DPHY0_TX_CLKP -MIPI_DPHY0_TX_CLKN
differential pair "04 06.DDR_CH1_DQS1_D": +DDR_CH1_DQS1P_D -DDR_CH1_DQS1N_D
differential pair "04 05.DDR_CH1_DQS0_D": +DDR_CH1_DQS0P_D -DDR_CH1_DQS0N_D
differential pair "04 03.DDR_CH1_DQS1_C": +DDR_CH1_DQS1P_C -DDR_CH1_DQS1N_C
differential pair "04 02.DDR_CH1_DQS0_C": +DDR_CH1_DQS0P_C -DDR_CH1_DQS0N_C
differential pair "01 05.DDR_CH0_DQS0_B": +DDR_CH0_DQS0P_B -DDR_CH0_DQS0N_B
differential pair "01 06.DDR_CH0_DQS1_B": +DDR_CH0_DQS1P_B -DDR_CH0_DQS1N_B
differential pair "01 03.DDR_CH0_DQS1_A": +DDR_CH0_DQS1P_A -DDR_CH0_DQS1N_A
differential pair "01 02.DDR_CH0_DQS0_A": +DDR_CH0_DQS0P_A -DDR_CH0_DQS0N_A
differential pair "04 04.DDR_CH1_CLK_D": +DDR_CH1_CLKP_D -DDR_CH1_CLKN_D
differential pair "04 01.DDR_CH1_CLK_C": +DDR_CH1_CLKP_C -DDR_CH1_CLKN_C
differential pair "01 04.DDR_CH0_CLK_B": +DDR_CH0_CLKP_B -DDR_CH0_CLKN_B
differential pair "01 01.DDR_CH0_CLK_A": +DDR_CH0_CLKP_A -DDR_CH0_CLKN_A

## Components (designator, comment, footprint, x,y, rotation, side; value= is the part's Value field where it differs from the comment)
BTB_1 "Component_1" F_100PIN 16.301,2.97 r270 bottom locked
BTB_2 "Component_1" F_100PIN 16.301,64.92 r270 bottom locked
BTB_3 "Component_1" F_100PIN 45.181,2.843 r270 bottom locked
BTB_4 "Component_1" F_100PIN 45.181,64.793 r270 bottom locked
C1 "10uf" C0603_L 17.675,49.946 r0 bottom
C2 "1uf" C0402_L 9.609,56.905 r270 top
C3 "22uf" C0603_L 16.213,55.381 r90 top
C4 "1uf" C0402_L 10.32,56.905 r270 top
C5 "1uf" C0402_L 11.032,56.898 r270 top
C6 "22uf" C0603_L 21.496,49.918 r270 bottom
C7 "22uf" C0603_L 21.547,49.907 r270 top
C8 "10uf" C0402_L 20.201,51.648 r270 top
C9 "1uf" C0402_L 18.002,51.114 r180 bottom
C10 "1uf" C0402_L 18.027,52.206 r180 top
C11 "47uf" C0805_L 18.55,55.737 r0 top
C12 "47uf" C0805_L 18.55,55.737 r0 bottom
C13 "22uf" C0603_L 20.948,54.252 r90 top
C14 "22uf" C0603_L 20.948,54.252 r90 bottom
C15 "1uf" C0402_L 11.743,56.898 r270 top
C16 "1uf" C0402_L 8.898,56.898 r270 top
C17 "1uf" C0402_L 8.187,56.898 r270 top
C18 "1uf" C0402_L 7.476,56.898 r270 top
C19 "10uf" C0603_L 16.315,43.494 r270 bottom
C20 "22uf" C0603_L 16.34,43.48 r270 top
C21 "2.2uf" C0402_L 4.486,45.475 r0 top
C22 "22uf" C0603_L 12.773,40.294 r180 bottom
C23 "22uf" C0603_L 12.773,40.294 r180 top
C24 "10uf" C0402_L 12.327,38.973 r180 top
C25 "100pf" C0402_L 13.953,42.097 r270 bottom
C26 "1uf" C0402_L 18.176,46.06 r180 top
C27 "22uf" C0603_L 19.324,42.859 r0 top
C28 "22uf" C0603_L 19.312,42.834 r0 bottom
C29 "22uf" C0603_L 21.496,43.559 r270 bottom
C30 "22uf" C0603_L 21.496,43.559 r270 top
C31 "1uf" C0402_L 4.478,46.187 r0 top
C32 "2.2uf" C0402_L 4.478,46.898 r0 top
C33 "2.2uf" C0402_L 4.478,47.609 r0 top
C34 "2.2uf" C0402_L 4.478,48.32 r0 top
C35 "1uf" C0402_L 4.486,49.031 r0 top
C36 "2.2uf" C0402_L 4.486,49.768 r0 top
C37 "10uf" C0603_L 3.22,52.562 r180 top
C38 "22uf" C0603_L 16.213,55.407 r90 bottom
C39 "22uf" C0603_L 3.234,54.709 r90 top
C40 "22uf" C0603_L 3.234,54.709 r90 bottom
C41 "10uf" C0402_L 2.091,55.196 r90 top
C42 "100pf" C0402_L 6.409,54.86 r90 bottom
C43 "1uf" C0402_L 12.225,54.899 r270 bottom
C44 "22uf" C0805_L 15.334,58.201 r180 bottom
C45 "22uf" C0805_L 15.334,58.201 r180 top
C46 "22uf" C0603_L 12.759,57.351 r270 top
C47 "22uf" C0603_L 12.759,57.351 r270 bottom
C48 "1uf" C0402_L 10.32,58.796 r270 top
C49 "10uf" C0603_L 4.287,50.708 r180 bottom
C50 "22uf" C0603_L 7.78,42.656 r180 bottom
C51 "1uf" C0402_L 4.49,44.546 r0 top
C52 "10uf" C0603_L 2.726,48.637 r90 top
C53 "22uf" C0603_L 2.751,48.65 r90 bottom
C54 "10uf" C0402_L 1.583,49.115 r90 top
C55 "1uf" C0402_L 10.422,42.859 r90 bottom
C56 "22uf" C0805_L 5.85,41.615 r270 bottom
C57 "22uf" C0805_L 5.883,41.599 r270 top
C58 "22uf" C0603_L 7.284,39.075 r0 top
C59 "22uf" C0603_L 7.272,39.049 r0 bottom
C60 "1uf" C0402_L 8.009,41.64 r0 bottom
C61 "10uf" C0603_L 12.352,44.078 r270 bottom
C62 "22uf" C0603_L 17.685,48.7 r0 bottom
C63 "1nf" C0402_L 15.019,43.959 r90 top
C64 "0.1uf" C0402_L 7.095,52.283 r270 bottom
C65 "10uf" C0603_L 10.422,39.176 r90 top
C66 "22uf" C0603_L 10.422,39.202 r90 bottom
C67 "10uf" C0402_L 9.203,39.641 r90 top
C68 "22uf" C0603_L 21.573,47.076 r90 top
C69 "22uf" C0603_L 21.573,47.076 r90 bottom
C70 "4.7uf" C0402_L 16.569,41.437 r0 top
C71 "1uf" C0402_L 3.681,37.691 r180 bottom
C72 "22uf" C0603_L 5.53,33.207 r0 bottom
C73 "22uf" C0603_L 5.479,31.836 r0 top
C74 "22uf" C0603_L 5.53,33.207 r0 top
C75 "22uf" C0603_L 5.53,34.579 r0 top
C76 "22uf" C0603_L 5.53,34.553 r0 bottom
C77 "10uf" C0402_L 9.573,36.066 r90 bottom
C78 "0.1uf" C0402_L 8.633,36.04 r90 bottom
C79 "22uf" C0603_L 1.745,33.854 r90 top
C80 "0.1uf" C0402_L 10.538,35.101 r270 bottom
C81 "22uf" C0603_L 3.32,33.854 r90 top
C82 "1uf" C0402_L 2.341,30.148 r180 bottom
C83 "22uf" C0603_L 4.109,27.023 r0 bottom
C84 "22uf" C0603_L 4.428,25.663 r0 top
C85 "22uf" C0603_L 4.109,25.677 r0 bottom
C86 "22uf" C0603_L 4.428,27.01 r0 top
C87 "22uf" C0603_L 4.109,24.306 r0 top
C88 "22uf" C0603_L 1.25,24.179 r0 top
C89 "22uf" C0603_L 1.899,26.349 r90 top
C90 "22uf" C0603_L 0.401,26.349 r90 top
C91 "10uf" C0402_L 23.813,40.918 r270 bottom
C92 "22pf" C0402_L 20.729,40.957 r270 bottom
C93 "22uf" C0603_L 20.196,37.615 r270 top
C94 "0.1uf" C0402_L 20.221,37.502 r270 bottom
C95 "1uf" C0402_L 18.816,36.694 r90 bottom
C96 "22uf" C0603_L 14.218,35.177 r270 bottom
C97 "22uf" C0603_L 12.847,35.202 r270 top
C98 "22uf" C0603_L 14.218,35.202 r270 top
C99 "22uf" C0603_L 15.539,35.177 r270 top
C100 "22uf" C0603_L 15.564,35.177 r270 bottom
C101 "22uf" C0603_L 14.789,37.31 r0 top
C102 "0.1uf" C0402_L 21.991,39.165 r270 bottom
C103 "22uf" C0603_L 14.789,38.682 r0 top
C104 "22uf" C0603_L 33.682,54.142 r315 bottom
C105 "22uf" C0603_L 34.616,55.051 r315 bottom
C106 "22uf" C0603_L 32.757,53.267 r315 bottom
C107 "10uf" C0402_L 40.482,38.682 r315 bottom
C108 "10uf" C0402_L 40.99,39.139 r315 bottom
C109 "4.7uf" C0402_L 42.514,37.107 r135 bottom
C110 "1uf" C0201_L 40.047,37.716 r45 bottom
C111 "0.1uf" C0201_L 41.117,36.675 r45 bottom
C112 "0.1uf" C0201_L 40.583,37.183 r45 bottom
C113 "0.1uf" C0201_L 43.294,30.849 r45 bottom
C114 "1uf" C0201_L 44.677,33.151 r225 bottom
C115 "1uf" C0201_L 43.835,32.154 r45 bottom
C116 "4.7uf" C0201_L 44.635,31.269 r45 bottom
C117 "10uf" C0402_L 43.403,32.535 r45 bottom
C118 "10uf" C0402_L 42.844,33.094 r45 bottom
C119 "22uf" C0603_L 14.352,10.1 r45 bottom
C120 "22uf" C0603_L 12.637,11.811 r45 bottom
C121 "22uf" C0603_L 13.496,10.967 r45 bottom
C122 "1uf" C0201_L 42.311,38.606 r315 bottom
C123 "0.1uf" C0201_L 43.754,30.389 r45 bottom
C124 "1uf" C0201_L 44.216,31.773 r45 bottom
C125 "22uf" C0603_L 25.821,46.292 r180 bottom
C126 "22uf" C0603_L 25.806,45.103 r180 bottom
C127 "10uf" C0402_L 39.999,36.091 r135 bottom
C128 "10uf" C0402_L 38.424,36.32 r315 bottom
C129 "4.7uf" C0402_L 38.92,37.272 r315 bottom
C130 "1uf" C0201_L 42.768,34.516 r135 bottom
C131 "1uf" C0201_L 44.597,29.005 r135 bottom
C132 "0.1uf" C0201_L 42.285,34.034 r135 bottom
C133 "0.1uf" C0201_L 45.098,29.47 r135 bottom
C134 "0.1uf" C0201_L 41.92,29.476 r225 bottom
C135 "0.1uf" C0201_L 41.422,29.919 r225 bottom
C136 "1uf" C0201_L 41.877,27.597 r45 bottom
C137 "1uf" C0201_L 42.336,29.005 r225 bottom
C138 "4.7uf" C0402_L 40.885,28.441 r45 bottom
C139 "10uf" C0402_L 40.431,28.928 r45 bottom
C140 "10uf" C0402_L 41.371,27.989 r45 bottom
C141 "22uf" C0603_L 33.018,18.457 r135 bottom
C142 "22uf" C0603_L 33.792,19.22 r135 bottom
C143 "22uf" C0603_L 34.543,19.993 r135 bottom
C144 "0.1uf" C0201_L 42.336,30.376 r315 bottom
C145 "1uf" C0201_L 43.261,29.472 r135 bottom
C146 "22uf" C0603_L -0.079,40.559 r0 top
C147 "22uf" C0603_L 2.735,40.546 r180 top
C148 "10uf" C0402_L 43.073,35.812 r45 bottom
C149 "10uf" C0402_L 44.266,35.482 r225 bottom
C150 "1uf" C0201_L 44.165,34.491 r45 bottom
C151 "0.1uf" C0201_L 44.647,34.11 r45 bottom
C152 "0.1uf" C0201_L 43.809,36.853 r225 bottom
C153 "1uf" C0201_L 44.647,36.802 r225 bottom
C154 "0.1uf" C0201_L 38.703,32.694 r45 bottom
C155 "4.7uf" C0402_L 39.056,32.128 r45 bottom
C156 "10uf" C0402_L 39.976,31.209 r45 bottom
C157 "10uf" C0402_L 39.542,31.672 r45 bottom
C158 "22uf" C0603_L 26.461,42.66 r225 bottom
C159 "22uf" C0603_L 26.911,41.768 r225 bottom
C160 "22uf" C0603_L 25.948,43.419 r225 bottom
C161 "22uf" C0603_L 23.301,34.843 r270 bottom
C162 "22uf" C0603_L 24.414,34.852 r270 bottom
C163 "22uf" C0603_L 25.511,34.829 r270 bottom
C164 "22uf" C0402_L 36.011,34.262 r45 bottom
C165 "10uf" C0402_L 36.926,33.653 r45 bottom
C166 "1uf" C0201_L 37.815,34.593 r225 bottom
C167 "0.1uf" C0201_L 38.653,34.085 r135 bottom
C168 "0.1uf" C0201_L 41.447,31.748 r225 bottom
C169 "1uf" C0201_L 40.526,30.81 r45 bottom
C170 "1uf" C0201_L 37.713,33.119 r135 bottom
C171 "0.1uf" C0201_L 38.208,33.613 r135 bottom
C172 "18pf" C0402_L 31.419,24.159 r315 top
C173 "0.1uf" C0201_L 38.241,24.879 r45 bottom
C174 "18pf" C0402_L 32.784,22.758 r135 top
C175 "1uf" C0201_L 41.828,26.993 r270 bottom
C176 "0.1uf" C0201_L 39.974,27.531 r225 bottom
C177 "1uf" C0201_L 40.075,33.551 r315 bottom
C178 "0.1uf" C0201_L 41.015,32.586 r135 bottom
C179 "0.1uf" C0201_L 39.161,26.846 r45 bottom
C180 "0.1uf" C0201_L 41.88,33.112 r45 bottom
C181 "0.1uf" C0201_L 39.542,27.989 r225 bottom
C182 "1uf" C0201_L 22.483,33.612 r270 bottom
C183 "0.1uf" C0201_L 38.678,28.522 r315 bottom
C184 "0.1uf" C0201_L 38.665,27.638 r315 bottom
C185 "10uf" C0402_L 48.42,32.579 r135 bottom
C186 "1uf" C0201_L 47.856,32.23 r135 bottom
C187 "1uf" C0201_L 47.397,31.771 r135 bottom
C188 "0.1uf" C0201_L 46.94,31.312 r135 bottom
C189 "0.1uf" C0201_L 48.771,33.144 r135 bottom
C190 "0.1uf" C0201_L 49.219,33.577 r135 bottom
C191 "1uf" C0201_L 46.527,33.221 r45 bottom
C192 "1uf" C0201_L 48.351,31.311 r45 bottom
C193 "10uf" C0402_L 45.574,37.324 r315 bottom
C194 "1uf" C0201_L 48.305,34.974 r225 bottom
C195 "1uf" C0201_L 46.513,36.817 r225 bottom
C196 "0.1uf" C0201_L 47.899,35.431 r225 bottom
C197 "0.1uf" C0201_L 47.441,35.913 r225 bottom
C198 "0.1uf" C0201_L 46.515,35.903 r45 bottom
C199 "1uf" C0201_L 48.777,34.489 r225 bottom
C200 "1uf" C0201_L 48.33,36.32 r315 bottom
C201 "10uf" C0402_L 46.109,30.287 r135 bottom
C202 "4.7uf" C0201_L 46.446,32.611 r0 bottom
C203 "0.1uf" C0201_L 46.552,34.948 r225 bottom
C204 "1uf" C0201_L 47.012,29.289 r180 bottom
C205 "1uf" C0201_L 46.044,32.078 r315 bottom
C206 "1uf" C0201_L 45.552,31.268 r225 bottom
C207 "0.1uf" C0201_L 44.671,30.385 r45 bottom
C208 "10uf" C0201_L 45.591,34.983 r45 bottom
C209 "4.7uf" C0201_L 45.554,36.361 r135 bottom
C210 "0.1uf" C0201_L 45.132,35.443 r45 bottom
C211 "1uf" C0201_L 47.492,34.059 r225 bottom
C212 "1uf" C0201_L 46.935,34.488 r225 bottom
C213 "1uf" C0201_L 46.053,33.609 r45 bottom
C214 "0.1uf" C0201_L 45.593,34.068 r45 bottom
C215 "1uf" C0201_L 38.247,30.376 r225 bottom
C216 "0.1uf" C0201_L 45.13,39.977 r45 bottom
C217 "0.1uf" C0201_L 45.591,39.573 r45 bottom
C218 "0.1uf" C0201_L 38.24,40.504 r45 bottom
C219 "1uf" C0201_L 38.729,40.003 r45 bottom
C220 "0.1uf" C0201_L 39.159,39.585 r45 bottom
C221 "1uf" C0201_L 40.025,39.647 r225 bottom
C222 "0.1uf" C0201_L 40.54,41.877 r45 bottom
C223 "0.1uf" C0201_L 40.993,40.922 r135 bottom
C224 "1uf" C0201_L 41.168,41.171 r180 bottom
C225 "0.1uf" C0201_L 40.05,42.289 r45 bottom
C226 "0.1uf" C0201_L 39.161,41.4 r225 bottom
C227 "1uf" C0201_L 39.618,40.943 r225 bottom
C228 "0.1uf" C0201_L 40.152,40.663 r225 bottom
C229 "1uf" C0201_L 40.964,40.079 r135 bottom
C230 "1nf" C0201_L 40.431,57.986 r180 bottom
C231 "1nf" C0201_L 1.29,59.129 r270 top
C232 "1nf" C0201_L 37.289,40.05 r315 bottom
C233 "1nf" C0201_L 35.097,41.501 r135 bottom
C234 "1nf" C0201_L 35.381,40.732 r180 bottom
C237 "0.1uf" C0201_L 37.205,38.682 r225 bottom
C239 "0.1uf" C0201_L 46.019,43.254 r135 bottom
C240 "0.1uf" C0201_L 45.587,27.608 r45 bottom
C241 "0.1uf" C0201_L 37.281,31.275 r225 bottom
C242 "1uf" C0201_L 37.284,36.366 r315 bottom
C244 "1uf" C0201_L 36.4,36.825 r45 bottom
C245 "0.1uf" C0201_L 36.862,35.871 r135 bottom
C248 "1uf" C0201_L 35.941,37.285 r45 bottom
C249 "0.1uf" C0201_L 23.035,43.976 r180 bottom
C252 "1uf" C0201_L 35.483,37.75 r45 bottom
C253 "0.1uf" C0201_L 25.095,36.952 r90 bottom
C256 "4.7uf" C0402_L 44.109,39.009 r45 bottom
C257 "4.7uf" C0402_L 36.636,55.118 r315 bottom
C260 "1uf" C0201_L 43.755,39.575 r45 bottom
C262 "1uf" C0201_L 44.647,40.917 r135 bottom
C263 "0.1uf" C0201_L 45.094,41.407 r135 bottom
C264 "4.7uf" C0201_L 25.684,36.951 r90 bottom
C265 "0.1uf" C0201_L 42.838,40.508 r45 bottom
C266 "1uf" C0201_L 42.378,41.392 r315 bottom
C267 "4.7uf" C0402_L 37.251,55.667 r315 bottom
C270 "1uf" C0201_L 43.296,40.035 r45 bottom
C272 "1uf" C0201_L 43.784,41.781 r315 bottom
C273 "0.1uf" C0201_L 44.21,42.291 r315 bottom
C274 "4.7uf" C0402_L 43.873,40.802 r135 bottom
C277 "10uf" C0201_L 39.517,26.439 r0 bottom
C278 "1uf" C0201_L 43.758,25.804 r45 bottom
C279 "4.7uf" C0402_L 21.842,34.075 r180 bottom
C280 "1uf" C0201_L 40.482,27.1 r225 bottom
C281 "1uf" C0201_L 44.631,26.248 r135 bottom
C282 "4.7uf" C0402_L 45.22,26.604 r135 bottom
C283 "0.1uf" C0201_L 39.918,25.931 r0 bottom
C284 "0.1uf" C0201_L 40.96,26.68 r225 bottom
C285 "1uf" C0201_L 43.301,26.261 r45 bottom
C286 "4.7uf" C0402_L 42.732,26.613 r45 bottom
C287 "1uf" C0201_L 43.757,27.144 r315 bottom
C288 "4.7uf" C0402_L 24.792,43.053 r270 top
C291 "0.1uf" C0201_L 45.557,28.517 r225 bottom
C292 "0.1uf" C0201_L 44.676,27.633 r45 bottom
C293 "0.1uf" C0201_L 38.2,31.274 r225 bottom
C294 "0.1uf" C0201_L 37.322,30.396 r45 bottom
C295 "0.1uf" C0201_L 35.938,33.112 r315 bottom
C296 "0.1uf" C0201_L 35.478,32.654 r315 bottom
C297 "10uf" C0402_L 62.339,54.239 r135 bottom
C298 "10uf" C0402_L 67.475,49.147 r180 bottom
C299 "0.1uf" C0201_L 60.421,52.652 r225 bottom
C300 "0.1uf" C0201_L 60.345,42.543 r45 bottom
C301 "0.1uf" C0201_L 57.008,49.316 r225 bottom
C302 "0.1uf" C0201_L 61.538,44.727 r225 bottom
C303 "0.1uf" C0201_L 64.688,48.309 r270 bottom
C304 "0.1uf" C0201_L 54.68,48.156 r225 bottom
C305 "0.1uf" C0201_L 61.903,53.869 r135 bottom
C306 "NC/1nf" C0201_L 65.552,49.502 r180 bottom
C307 "22uf" C0603_L 66.999,44.524 r90 bottom
C308 "10uf" C0402_L 63.418,52.423 r315 bottom
C309 "10uf" C0402_L 65.933,50.01 r135 bottom
C310 "1uf" C0201_L 56.865,55.167 r180 bottom
C311 "1uf" C0201_L 57.389,50.375 r315 bottom
C312 "0.1uf" C0201_L 58.567,44.448 r225 bottom
C313 "0.1uf" C0201_L 63.697,41.628 r90 bottom
C314 "0.1uf" C0201_L 59.278,51.484 r270 bottom
C315 "0.1uf" C0201_L 63.52,50.544 r225 bottom
C316 "0.1uf" C0201_L 55.036,46.886 r270 bottom
C317 "0.1uf" C0201_L 57.779,47.318 r225 bottom
C318 "0.1uf" C0201_L 53.741,51.56 r90 bottom
C319 "0.1uf" C0201_L 62.834,51.433 r225 bottom
C320 "0.1uf" C0201_L 56.662,46.327 r225 bottom
C321 "0.1uf" C0201_L 64.485,50.823 r0 bottom
C322 "22uf" C0603_L 69.057,47.877 r135 bottom
C323 "10uf" C0402_L 67.152,47.064 r270 bottom
C324 "10uf" C0402_L 65.171,45.896 r225 bottom
C325 "1uf" C0201_L 60.548,53.439 r180 bottom
C326 "1uf" C0201_L 64.917,43.025 r135 bottom
C327 "0.1uf" C0201_L 65.196,48.563 r270 bottom
C328 "0.1uf" C0201_L 63.139,41.222 r135 bottom
C329 "0.1uf" C0201_L 57.144,53.439 r180 bottom
C330 "0.1uf" C0201_L 67.838,47.978 r135 bottom
C331 "0.1uf" C0201_L 66.043,44.261 r135 bottom
C332 "0.1uf" C0201_L 53.995,50.696 r0 bottom
C333 "0.1uf" C0201_L 56.128,51.687 r135 bottom
C334 "0.1uf" C0201_L 53.664,48.715 r225 bottom
C335 "0.1uf" C0201_L 57.796,52.973 r225 bottom
C336 "0.1uf" C0201_L 61.107,54.836 r135 bottom
C337 "0.1uf" C0201_L 57.728,55.116 r315 bottom
C338 "0.1uf" C0201_L 63.545,44.321 r135 bottom
C339 "0.1uf" C0201_L 61.289,41.984 r180 bottom
C340 "0.1uf" C0201_L 56.916,51.458 r315 bottom
C341 "10uf" C0402_L 68.008,18.464 r0 bottom
C342 "10uf" C0402_L 66.136,21.791 r270 bottom
C343 "0.1uf" C0201_L 69.959,20.17 r225 bottom
C344 "0.1uf" C0201_L 67.965,19.403 r0 bottom
C345 "0.1uf" C0201_L 58.694,19.657 r225 bottom
C346 "0.1uf" C0201_L 61.056,16.533 r0 bottom
C347 "0.1uf" C0201_L 62.504,14.196 r0 bottom
C348 "0.1uf" C0201_L 62.986,23.62 r135 bottom
C349 "0.1uf" C0201_L 61.208,26.007 r135 bottom
C350 "NC/1nf" C0201_L 63.697,14.374 r225 bottom
C351 "22uf" C0603_L 58.44,13.511 r135 bottom
C352 "10uf" C0402_L 66.556,18.198 r225 bottom
C353 "10uf" C0402_L 64.37,16.266 r45 bottom
C354 "1uf" C0201_L 61.192,23.451 r225 bottom
C355 "1uf" C0201_L 58.516,18.667 r315 bottom
C356 "0.1uf" C0201_L 63.13,22.824 r225 bottom
C357 "0.1uf" C0201_L 61.005,18.083 r0 bottom
C358 "0.1uf" C0201_L 59.786,24.458 r135 bottom
C359 "0.1uf" C0201_L 55.747,16.533 r135 bottom
C360 "0.1uf" C0201_L 58.008,22.959 r135 bottom
C361 "0.1uf" C0201_L 63.723,24.052 r270 bottom
C362 "0.1uf" C0201_L 59.497,19.793 r315 bottom
C363 "0.1uf" C0201_L 65.018,21.791 r270 bottom
C364 "0.1uf" C0201_L 63.824,17.778 r135 bottom
C365 "0.1uf" C0201_L 68.93,23.848 r135 bottom
C366 "22uf" C0603_L 61.564,12.266 r45 bottom
C367 "10uf" C0402_L 68.828,20.546 r45 bottom
C368 "10uf" C0402_L 65.831,23.391 r45 bottom
C369 "1uf" C0201_L 61.827,15.729 r225 bottom
C370 "1uf" C0201_L 69.184,23.112 r225 bottom
C371 "0.1uf" C0201_L 57.068,17.752 r45 bottom
C372 "0.1uf" C0201_L 58.541,16.178 r225 bottom
C373 "0.1uf" C0201_L 56.408,17.93 r135 bottom
C374 "0.1uf" C0201_L 62.605,25.068 r0 bottom
C375 "0.1uf" C0201_L 59.354,13.917 r45 bottom
C376 "0.1uf" C0201_L 64.866,25.22 r225 bottom
C377 "0.1uf" C0201_L 64.663,27.506 r225 bottom
C378 "0.1uf" C0201_L 61.488,13.282 r45 bottom
C379 "0.1uf" C0201_L 56.839,16.99 r315 bottom
C380 "0.1uf" C0201_L 59.43,16.279 r315 bottom
C381 "0.1uf" C0201_L 66.415,20.318 r45 bottom
C382 "0.1uf" C0201_L 61.843,27.379 r45 bottom
C383 "0.1uf" C0201_L 55.214,19.962 r135 bottom
C384 "0.1uf" C0201_L 69.235,20.242 r45 bottom
C385 "0.1uf" C0402_L 13.035,27.441 r90 bottom
C386 "0.1uf" C0402_L 14.602,29.793 r90 bottom
C387 "4.7uf" C0402_L 13.24,25.588 r270 bottom
C388 "0.1uf" C0402_L 16.102,25.491 r225 bottom
C389 "0.1uf" C0402_L 15.16,25.991 r180 bottom
C390 "0.1uf" C0402_L 12.037,28.134 r90 bottom
C391 "0.1uf" C0402_L 12.019,26.541 r270 bottom
C392 "4.7uf" C0402_L 11.351,28.134 r90 bottom
C393 "2.2uf" C0402_L 12.095,25.073 r180 bottom
C394 "0.1uf" C0402_L 14.577,27.202 r315 bottom
C395 "10pf" C0402_L 16.195,27.38 r180 bottom
C396 "0.1uf" C0201_L 16.301,14.222 r270 bottom
C397 "1uf" C0402_L 15.691,14.57 r270 bottom
C398 "0.1uf" C0402_L 11.043,12.476 r90 top
C399 "0.1uf" C0402_L 8.624,16.747 r0 top
C400 "NC" C0402_L 60.709,5.144 r90 bottom
C401 "NC" C0402_L 63.91,5.111 r90 bottom
C402 "0.1uf" C0402_L 67.313,5.162 r90 bottom
C403 "0.1uf" C0402_L 70.539,5.111 r90 bottom
FB1 "120R@100MHz" FB0402 4.541,23.01 r180 top
JP1 "CON-6P" SH1.0-WT-7P 0.996,12.333 r270 top
L1 "470nH" L0805 19.007,49.565 r0 top
L2 "0.22uH" L0805 18.535,53.73 r0 top
L3 "470nH" L0805 12.352,43.128 r270 top
L4 "0.22uH" L0805 18.941,44.536 r0 top
L5 "470nH" L0805 4.885,55.102 r90 top
L6 "0.22uH" L0805 14.486,55.722 r90 top
L7 "470nH" L0805 3.64,51.038 r180 top
L8 "0.22uH" L0805 7.755,41.604 r270 top
L9 "470nH" L0805 10.168,42.377 r270 top
L10 "470nH" L0805 18.001,47.431 r0 top
L11 "0.22uH" L0805 4.505,36.269 r0 top
L12 "0.22uH" L0805 3.195,28.801 r0 top
L13 "0.22uH" L0805 17.292,35.863 r270 top
L14 "2.2uH" L0805 22.736,37.197 r180 top
LED1 "红色" LED0603_R 1.506,21.622 r0 top
LED2 "绿色" LED0603_R 68.163,10.701 r90 top
Q1 "SS8050/Y1" SOT-23-3_L2.9-W1.3-P1.90-LS2.4-TL 65.214,10.854 r0 top
R1 "100R" R0402_L 18.027,51.114 r180 top
R2 "100R" R0402_L 18.027,52.206 r180 bottom
R3 "120K" R0402_L 13.955,42.111 r270 top
R4 "100R" R0402_L 18.201,46.06 r180 bottom
R5 "100K" R0402_L 13.978,43.97 r270 top
R6 "25.5K" R0402_L 34.73,58.395 r90 bottom
R7 "20K" R0402_L 6.409,54.885 r90 top
R8 "100R" R0402_L 13.013,54.899 r270 bottom
R9 "100K" R0402_L 7.323,54.884 r270 top
R10 "100R" R0402_L 9.508,42.859 r90 bottom
R11 "200K" R0402_L 15.019,43.984 r90 bottom
R12 "200K" R0402_L 15.019,42.079 r90 top
R13 "100K" R0402_L 8.161,46.72 r270 bottom
R14 "10K" R0402_L 7.736,45.45 r0 bottom
R15 "NC 100K" R0402_L 6.383,45.044 r90 bottom
R16 "10K" R0402_L 17.331,47.457 r180 bottom
R17 "10K" R0402_L 35.614,58.395 r270 bottom
R18 "4.7K" R0402_L 69.473,10.214 r270 top
R19 "100K" R0402_L 1.771,38.008 r0 bottom
R20 "100R" R0402_L 3.669,37.703 r180 top
R21 "1K" R0402_L 11.453,35.101 r270 bottom
R22 "120K" R0402_L 1.778,37.982 r180 top
R23 "3.4K" R0402_L 9.116,34.669 r180 bottom
R24 "100R" R0402_L 2.324,30.173 r180 top
R25 "100K" R0402_L 20.754,40.982 r270 top
R26 "10K" R0402_L 21.085,39.179 r90 bottom
R27 "100R" R0402_L 18.816,36.694 r90 top
R28 "120K" R0402_L 19.84,40.989 r90 top
R29 "22R" R0402_L 32.303,24.433 r135 top